# Altium PCB Phaser.PcbDoc (part 1 of 16)
Units mm, origin at the board's own origin, x right, y up, seen from the top; angles counter-clockwise.
Board outline 161.99 x 100 mm, 6 copper layers (TopLayer, MidLayer1, MidLayer2, SignalLayer1, Internal Plane 1, BottomLayer), stack 1.528 mm thick; 1017 components, 665 nets, 3453 pads, 2223 vias.
Unrouted connection lines stored in the file: 1.
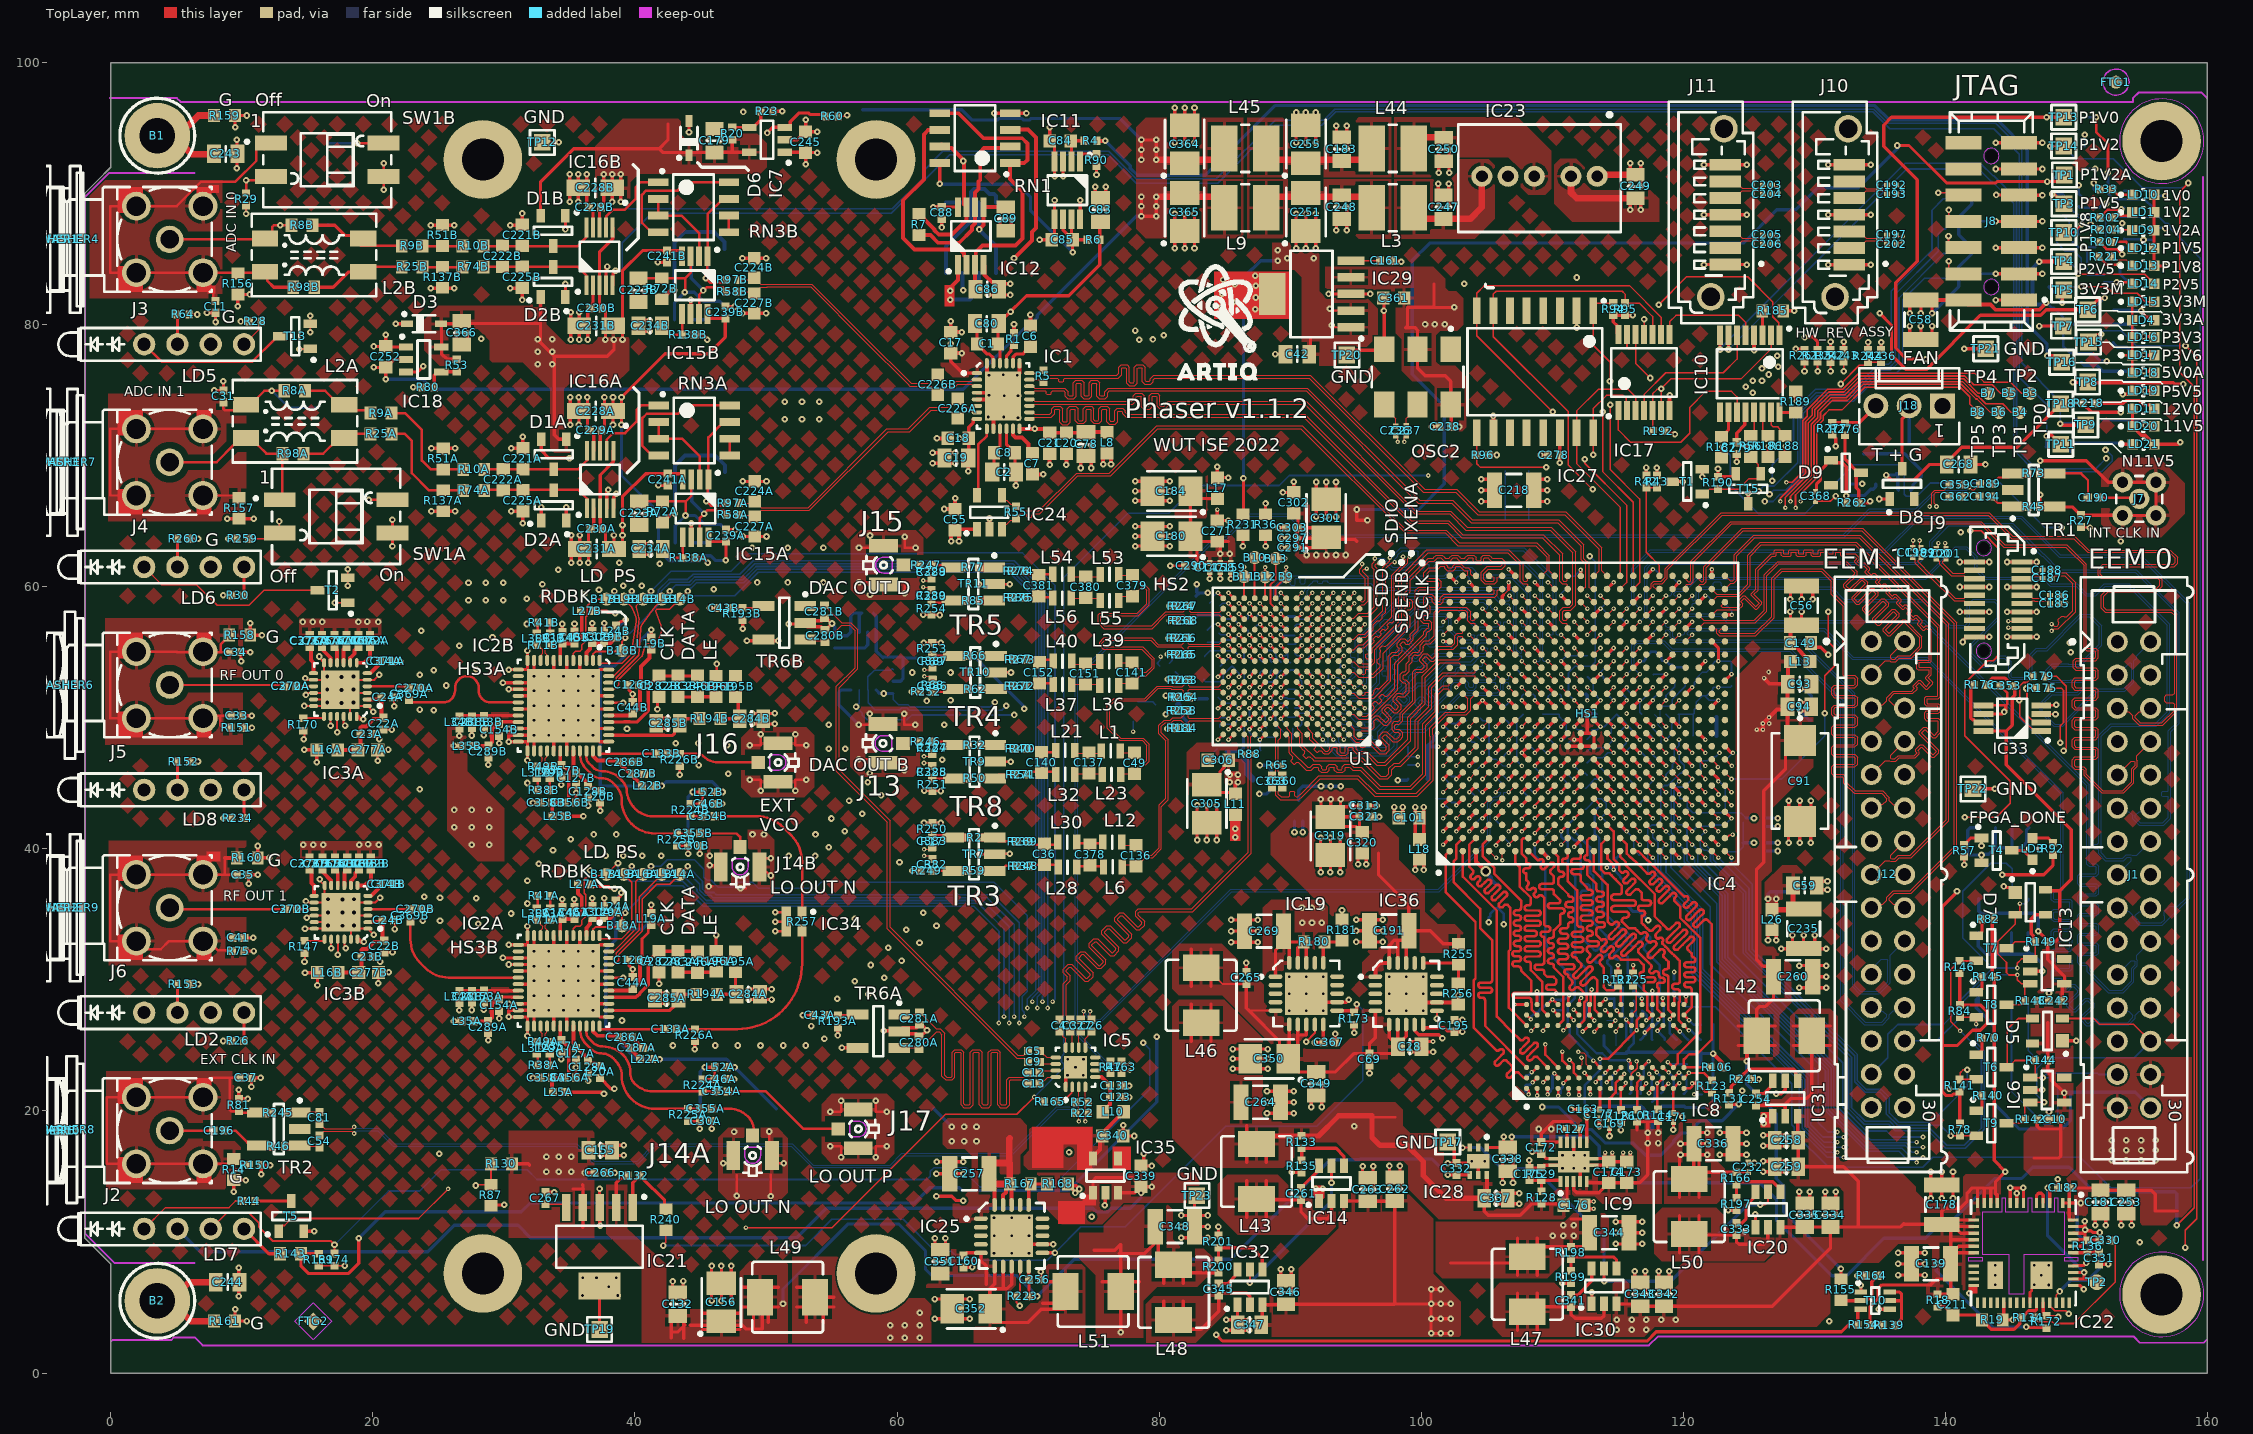
[diagram p0: TopLayer view]
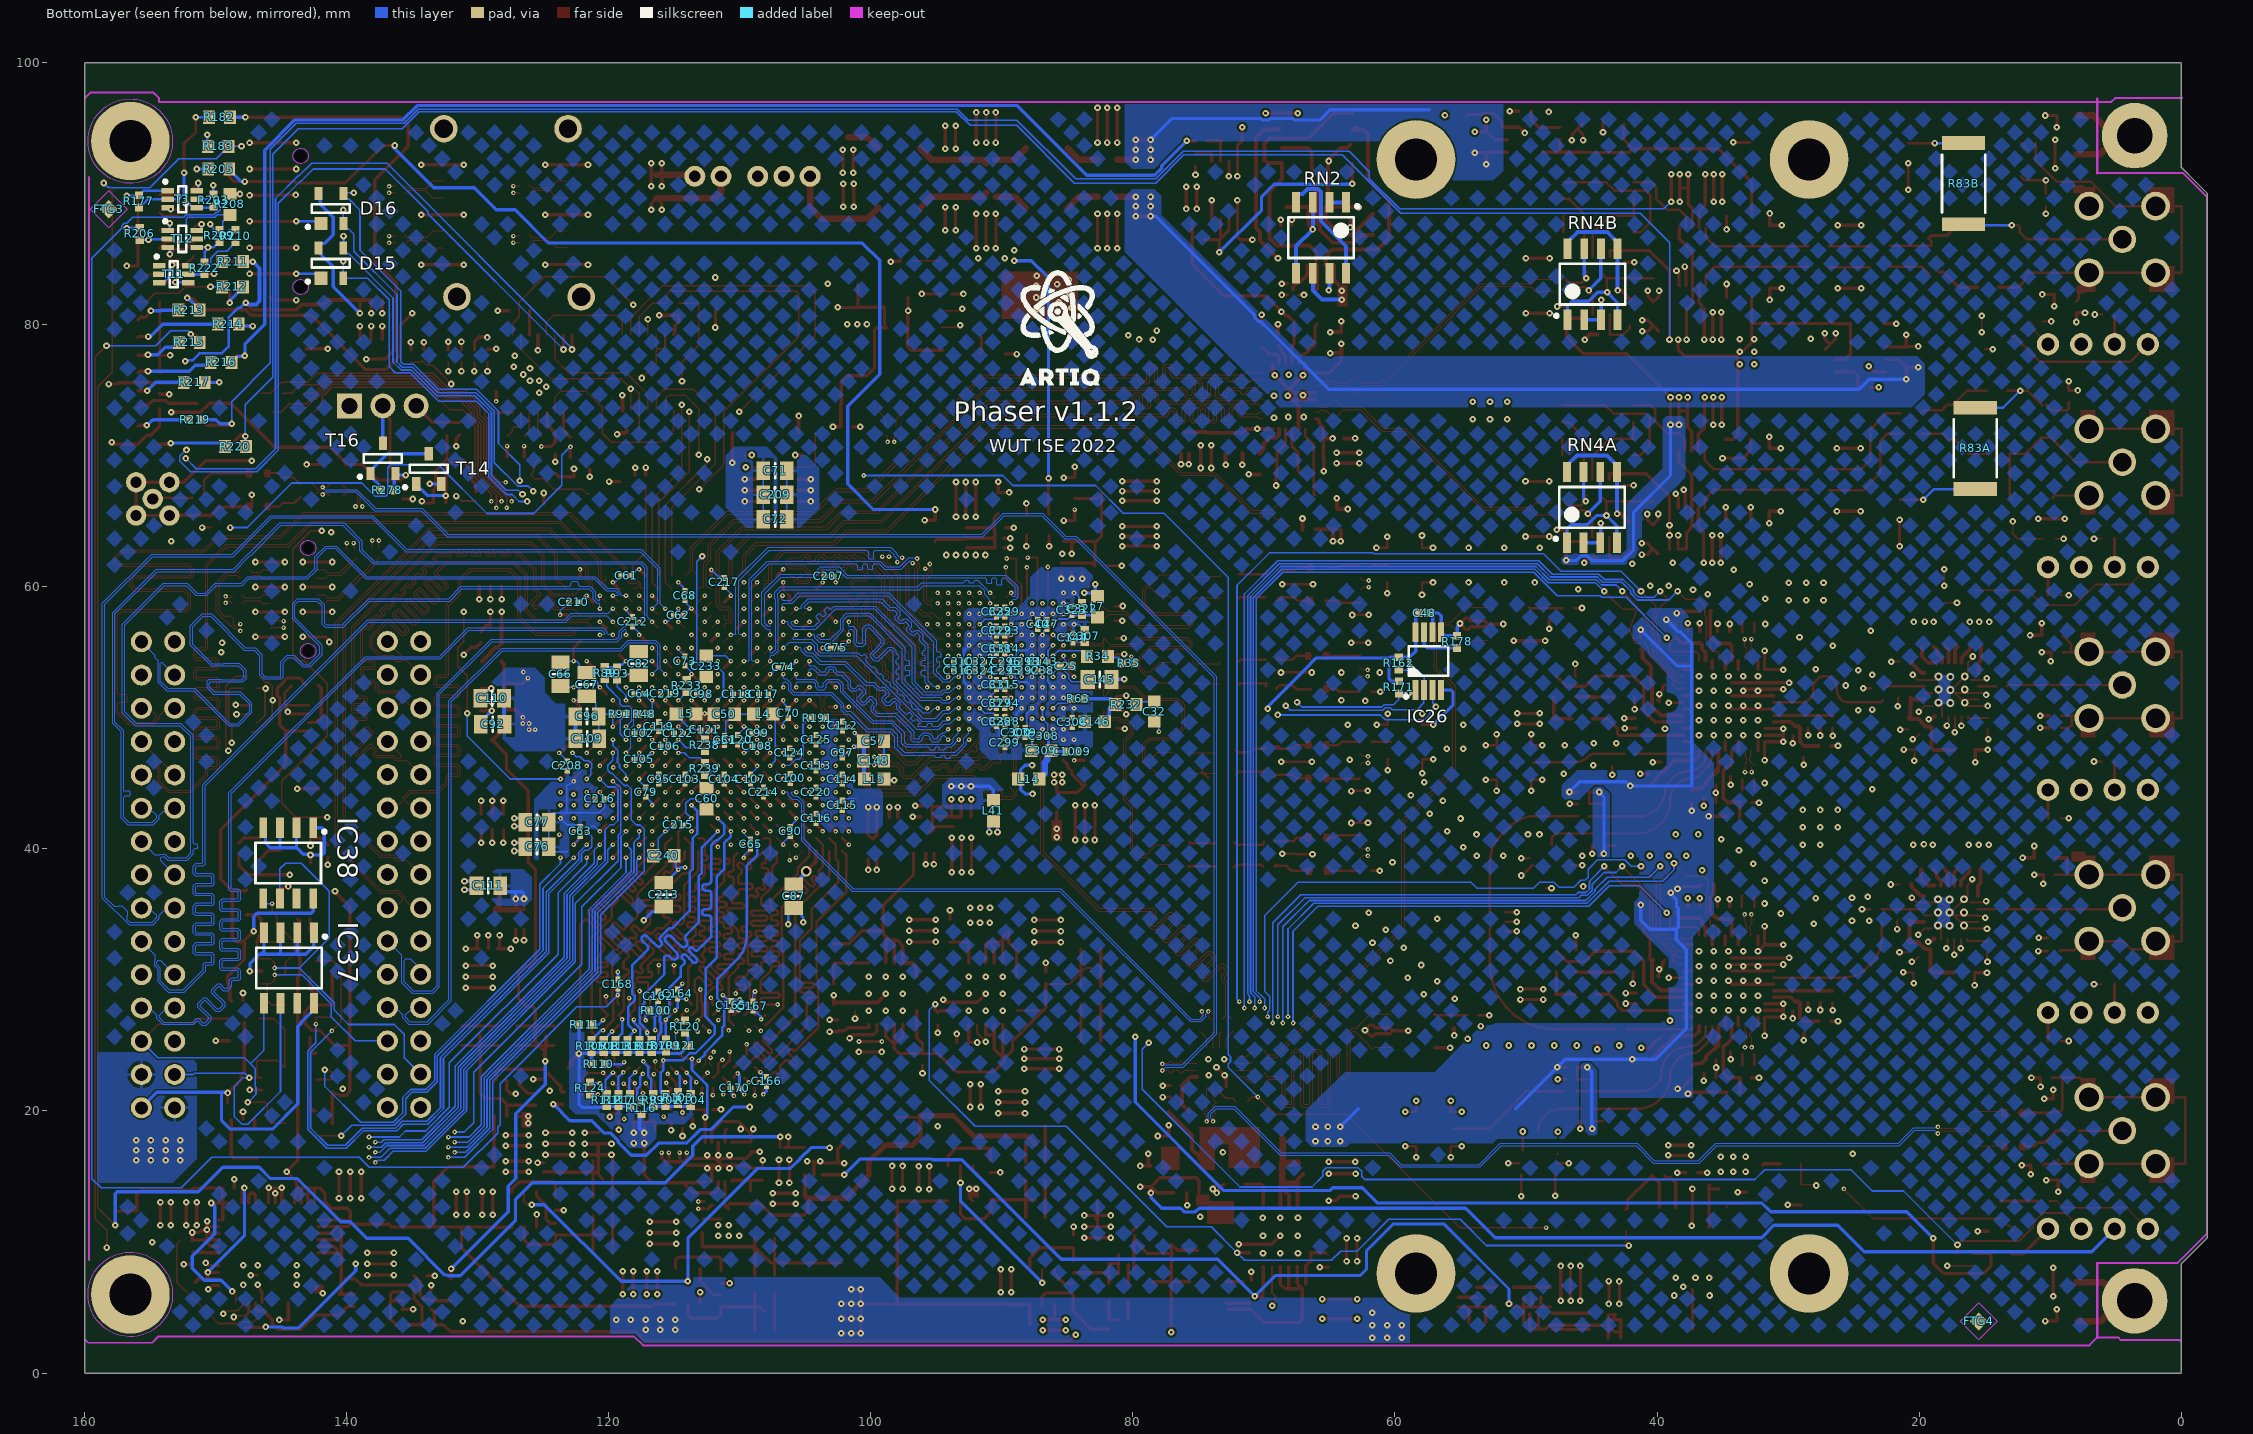
[diagram p1: BottomLayer view, seen from below]
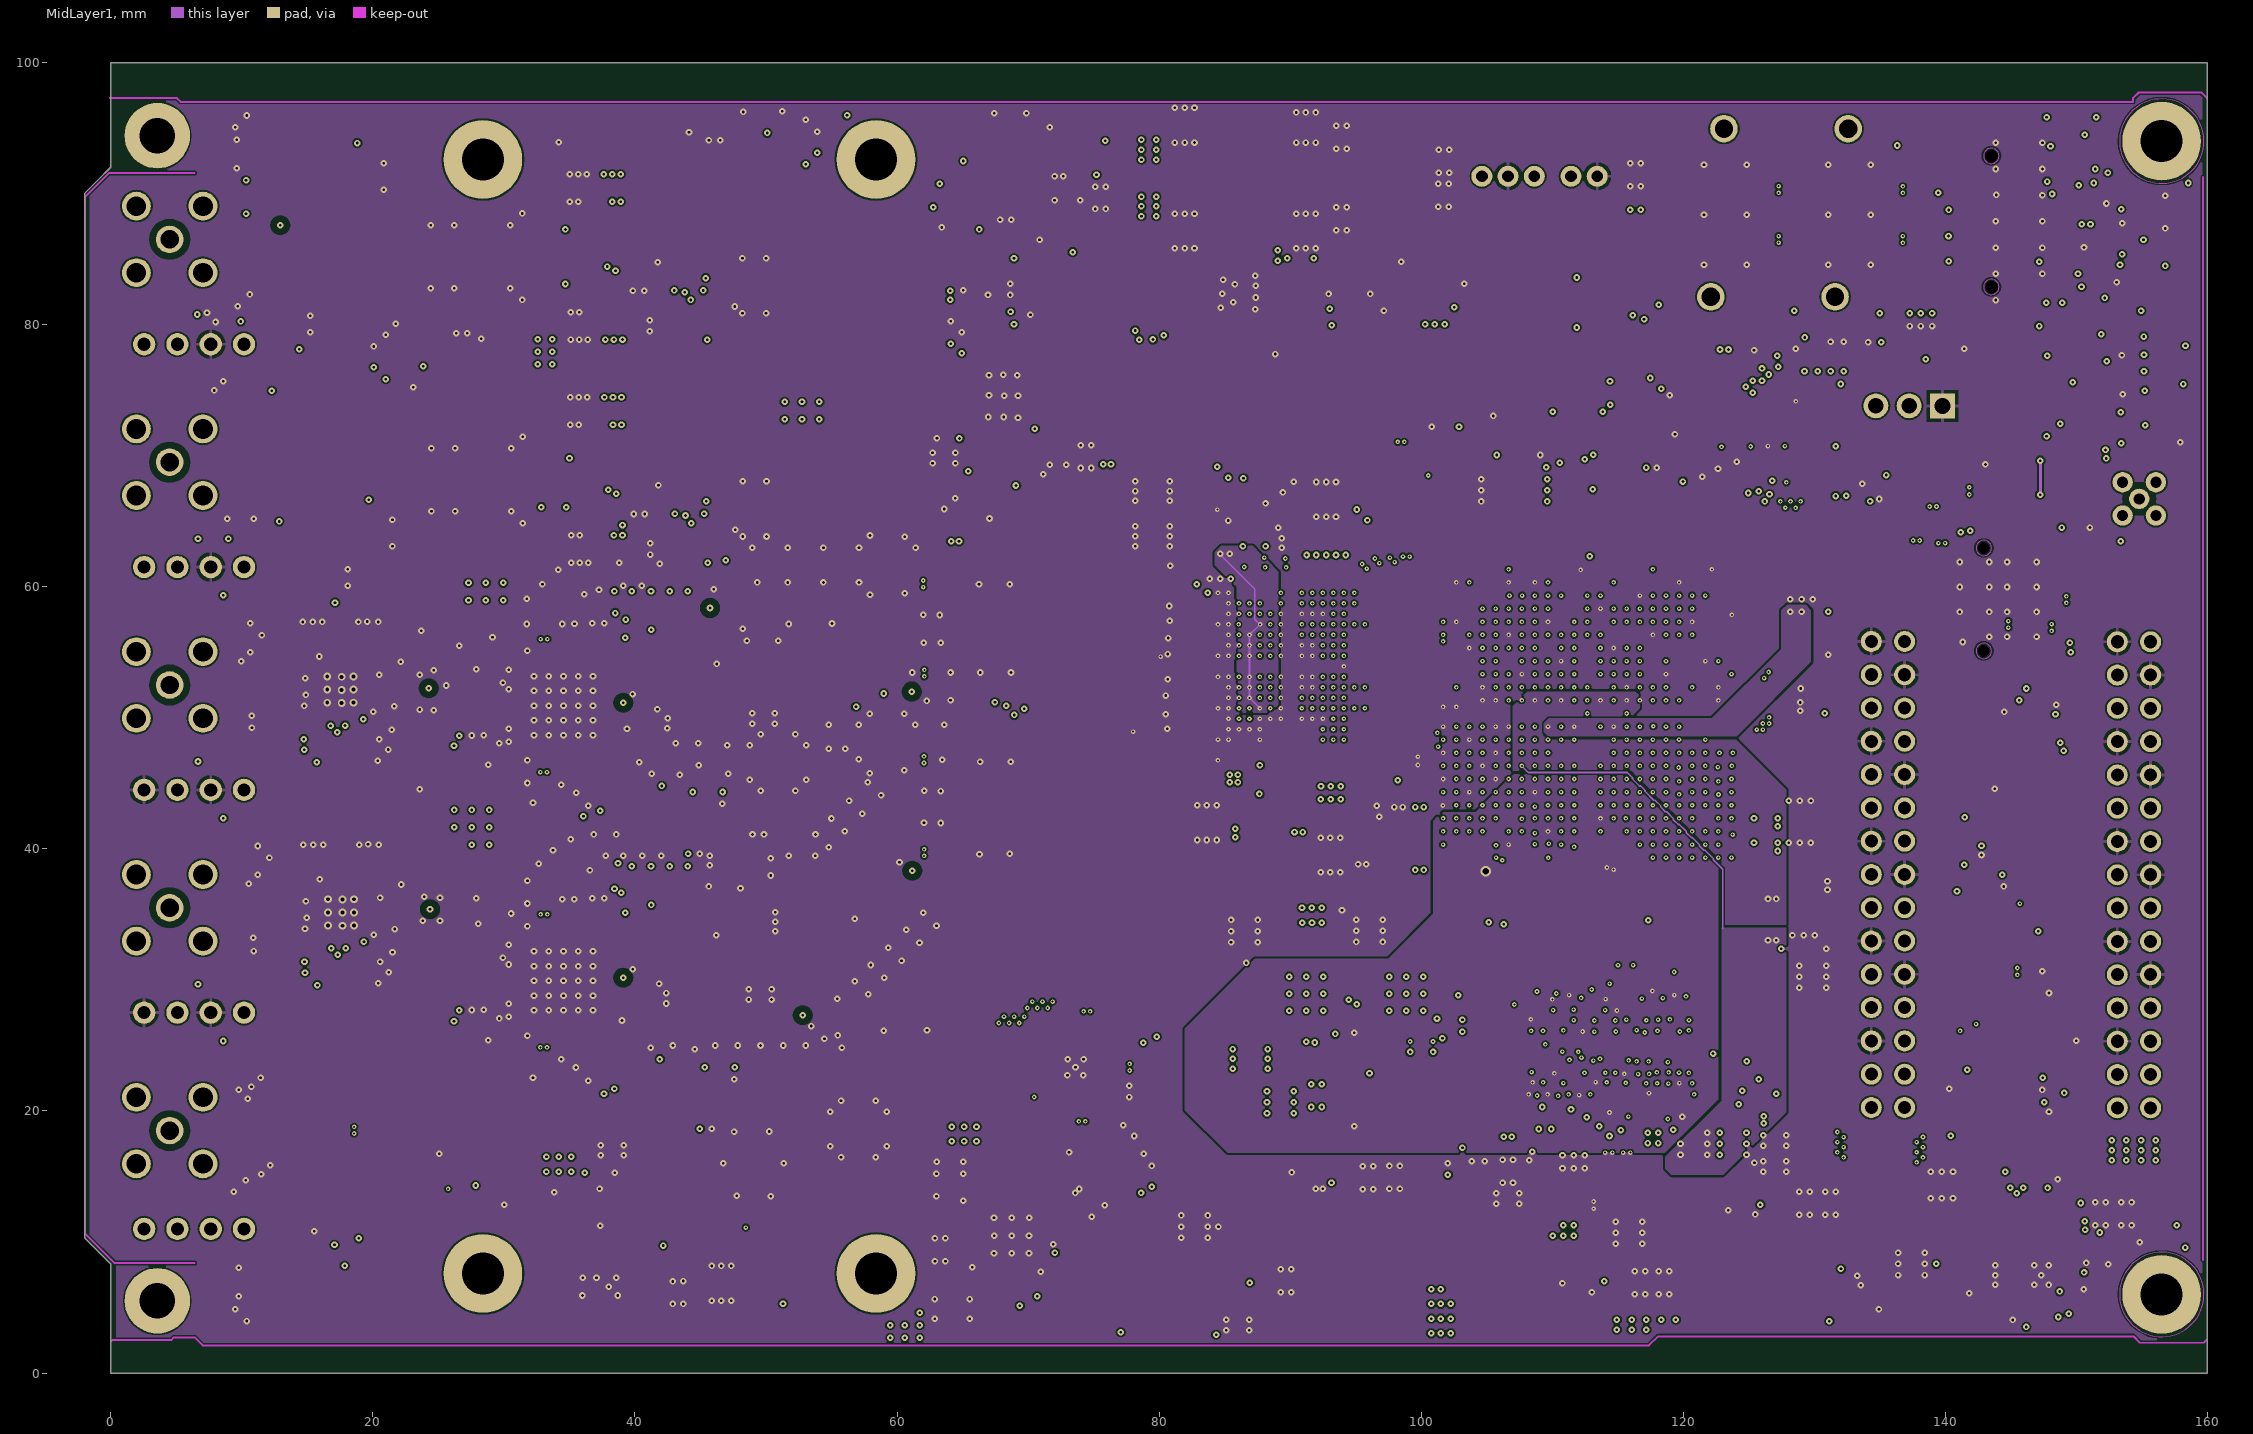
[diagram p2: MidLayer1]
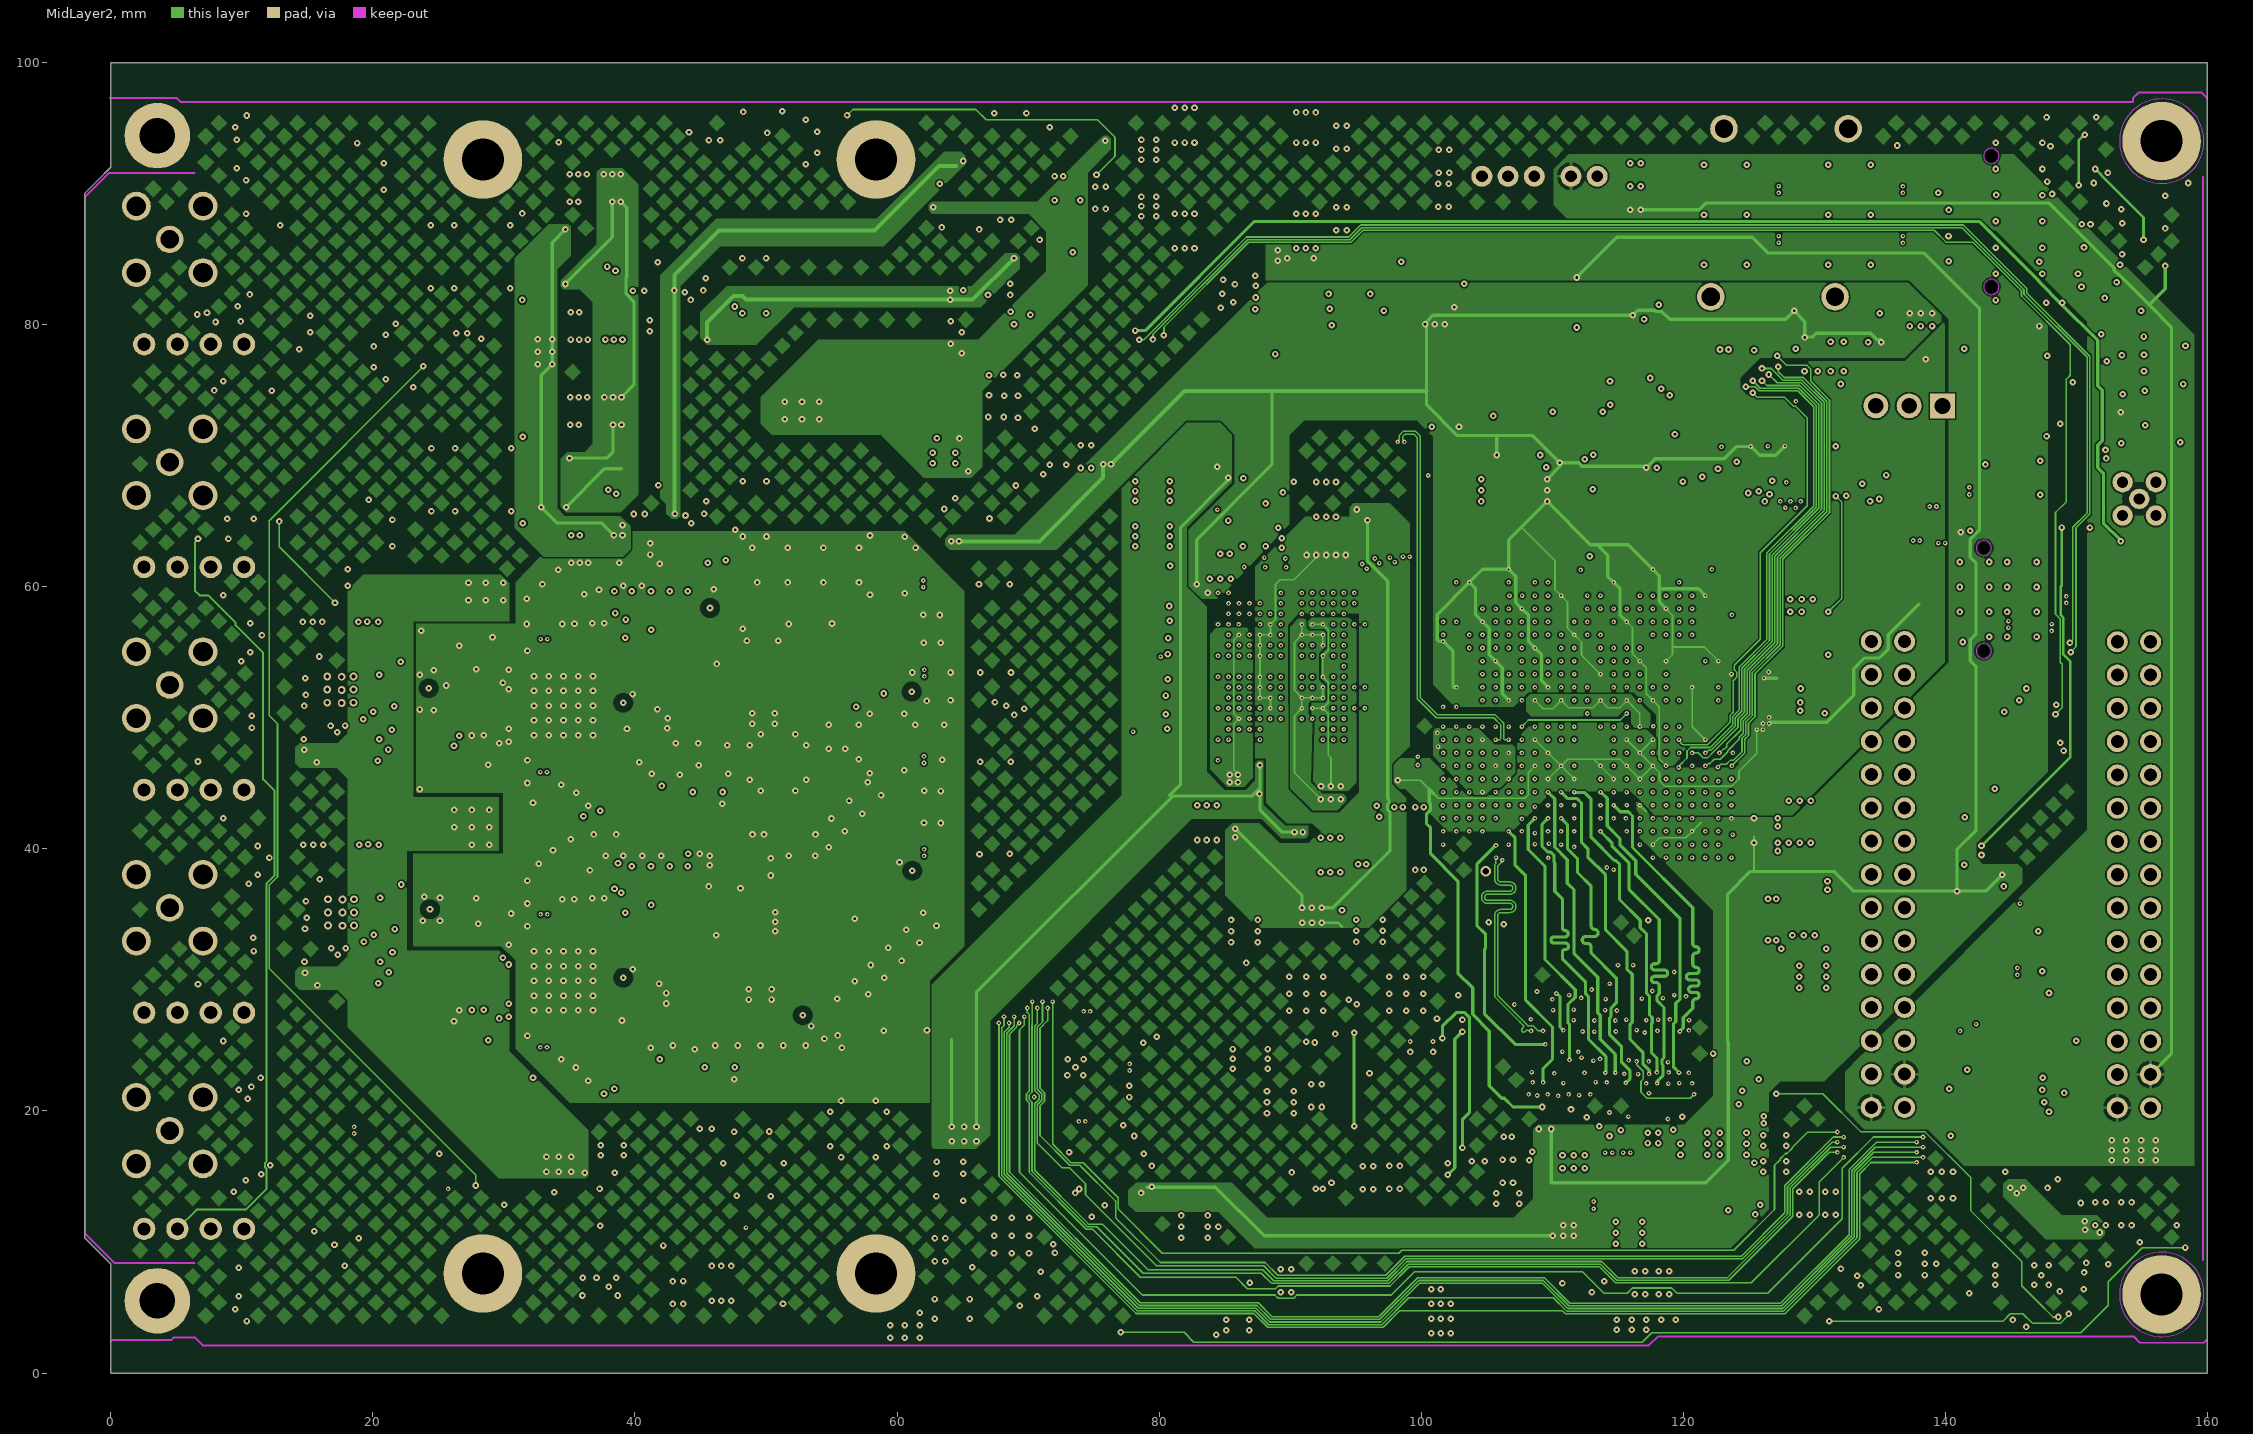
[diagram p3: MidLayer2]
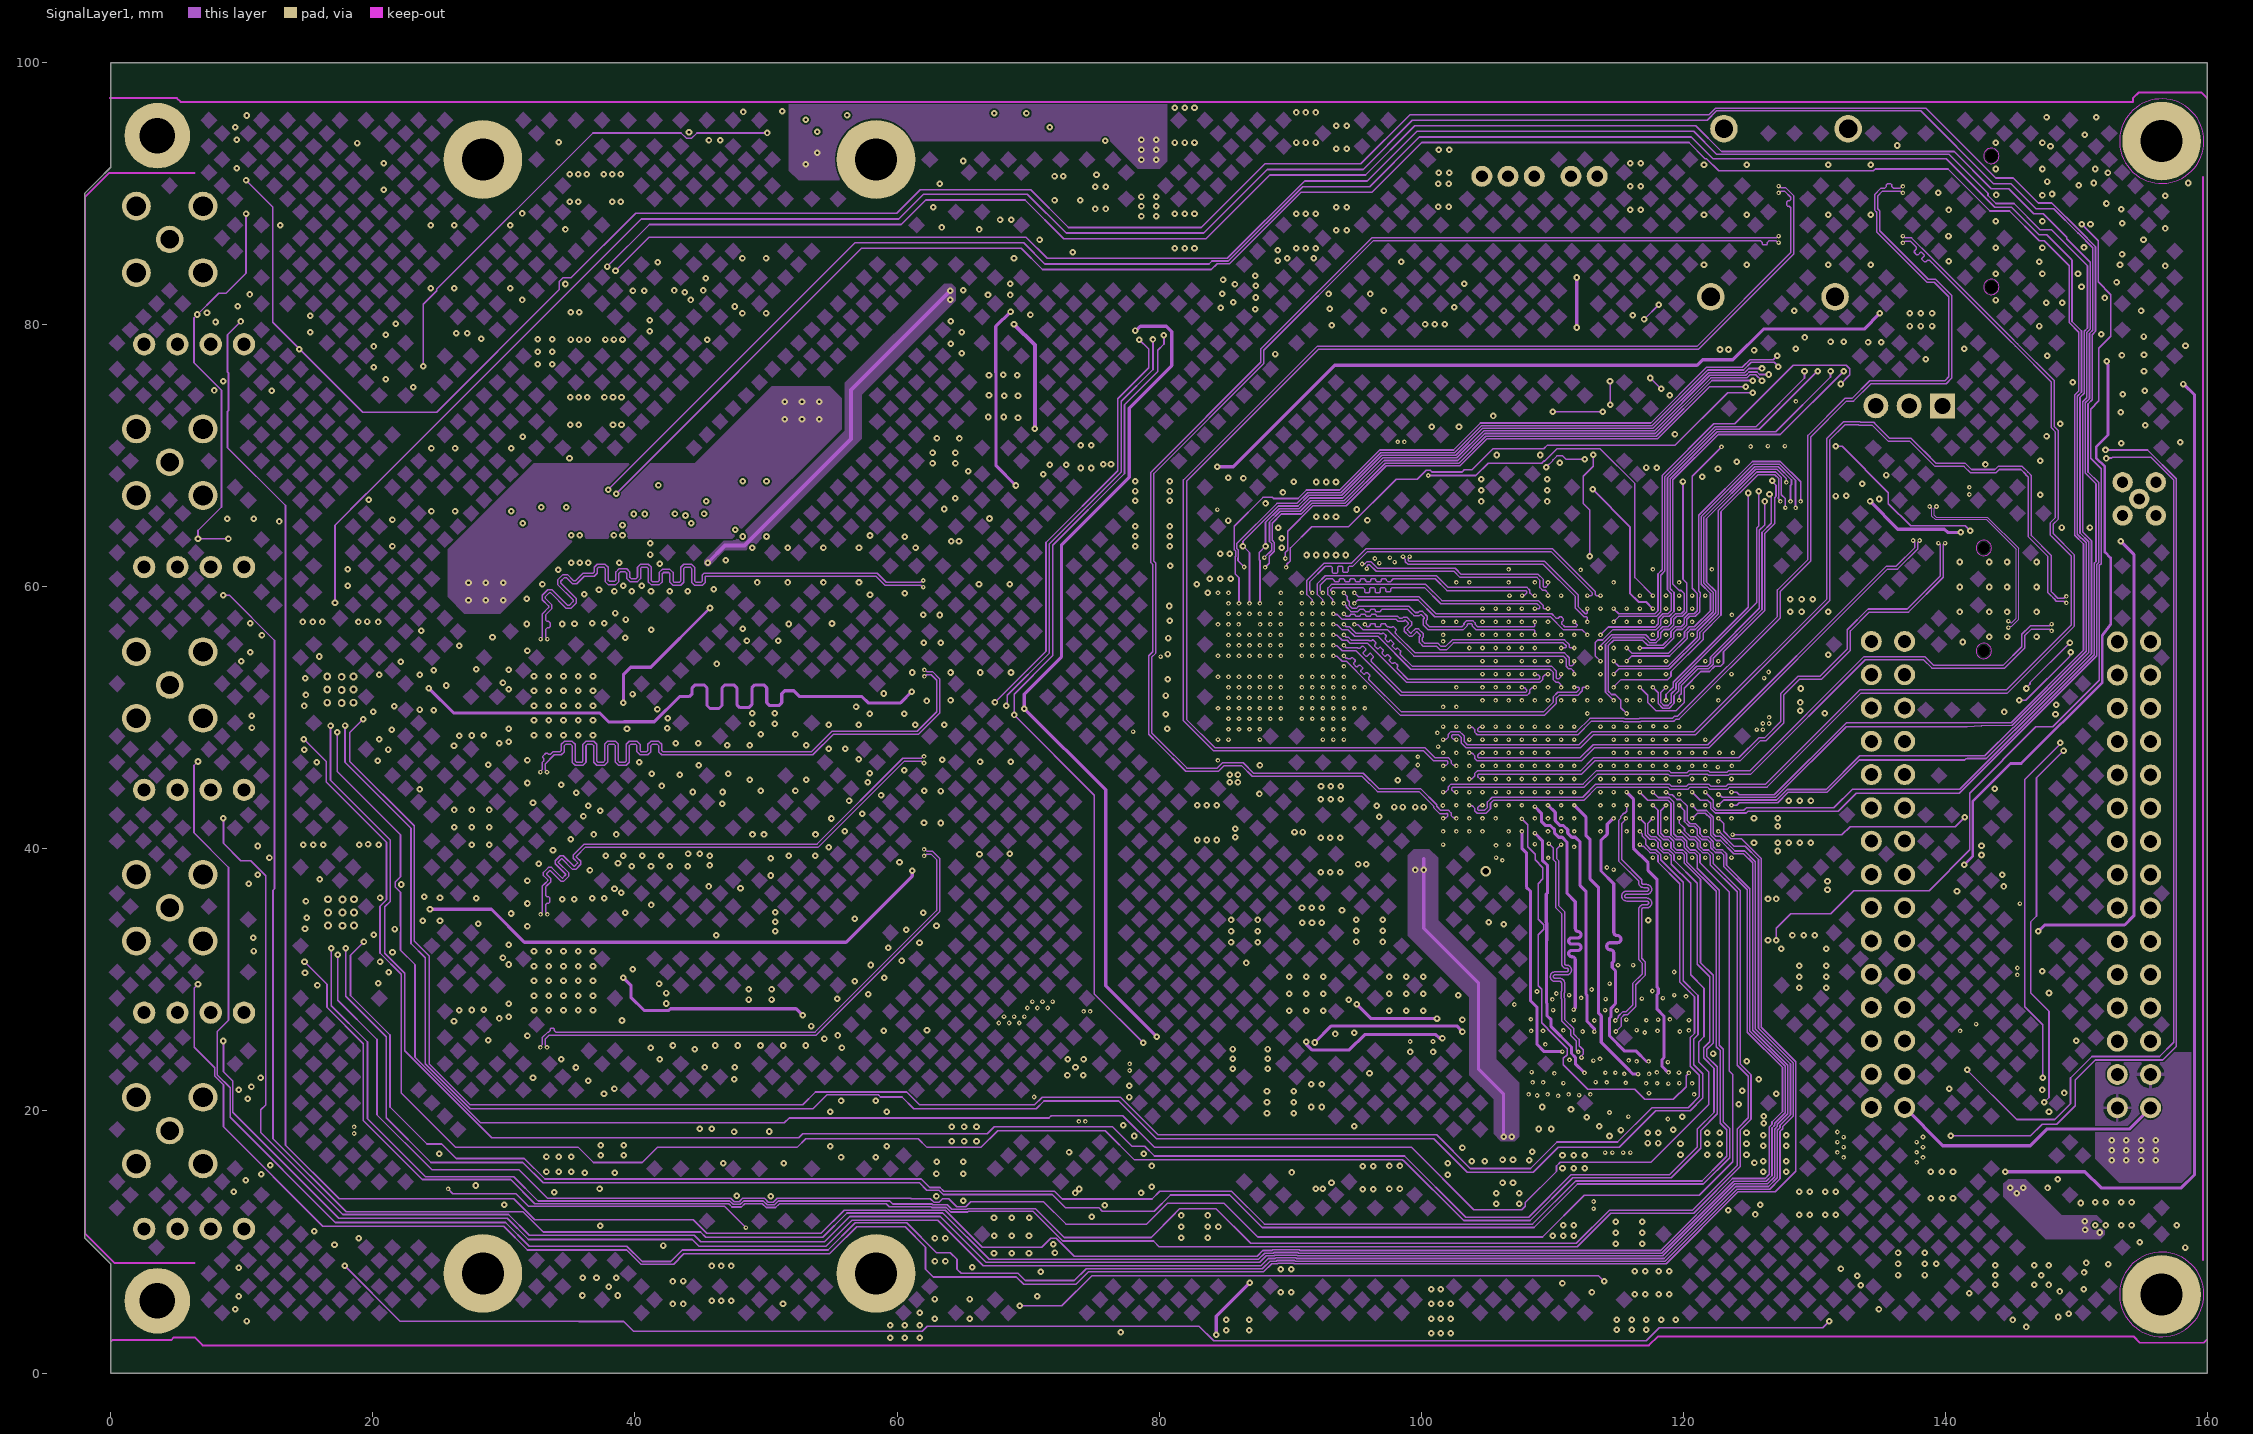
[diagram p4: SignalLayer1]
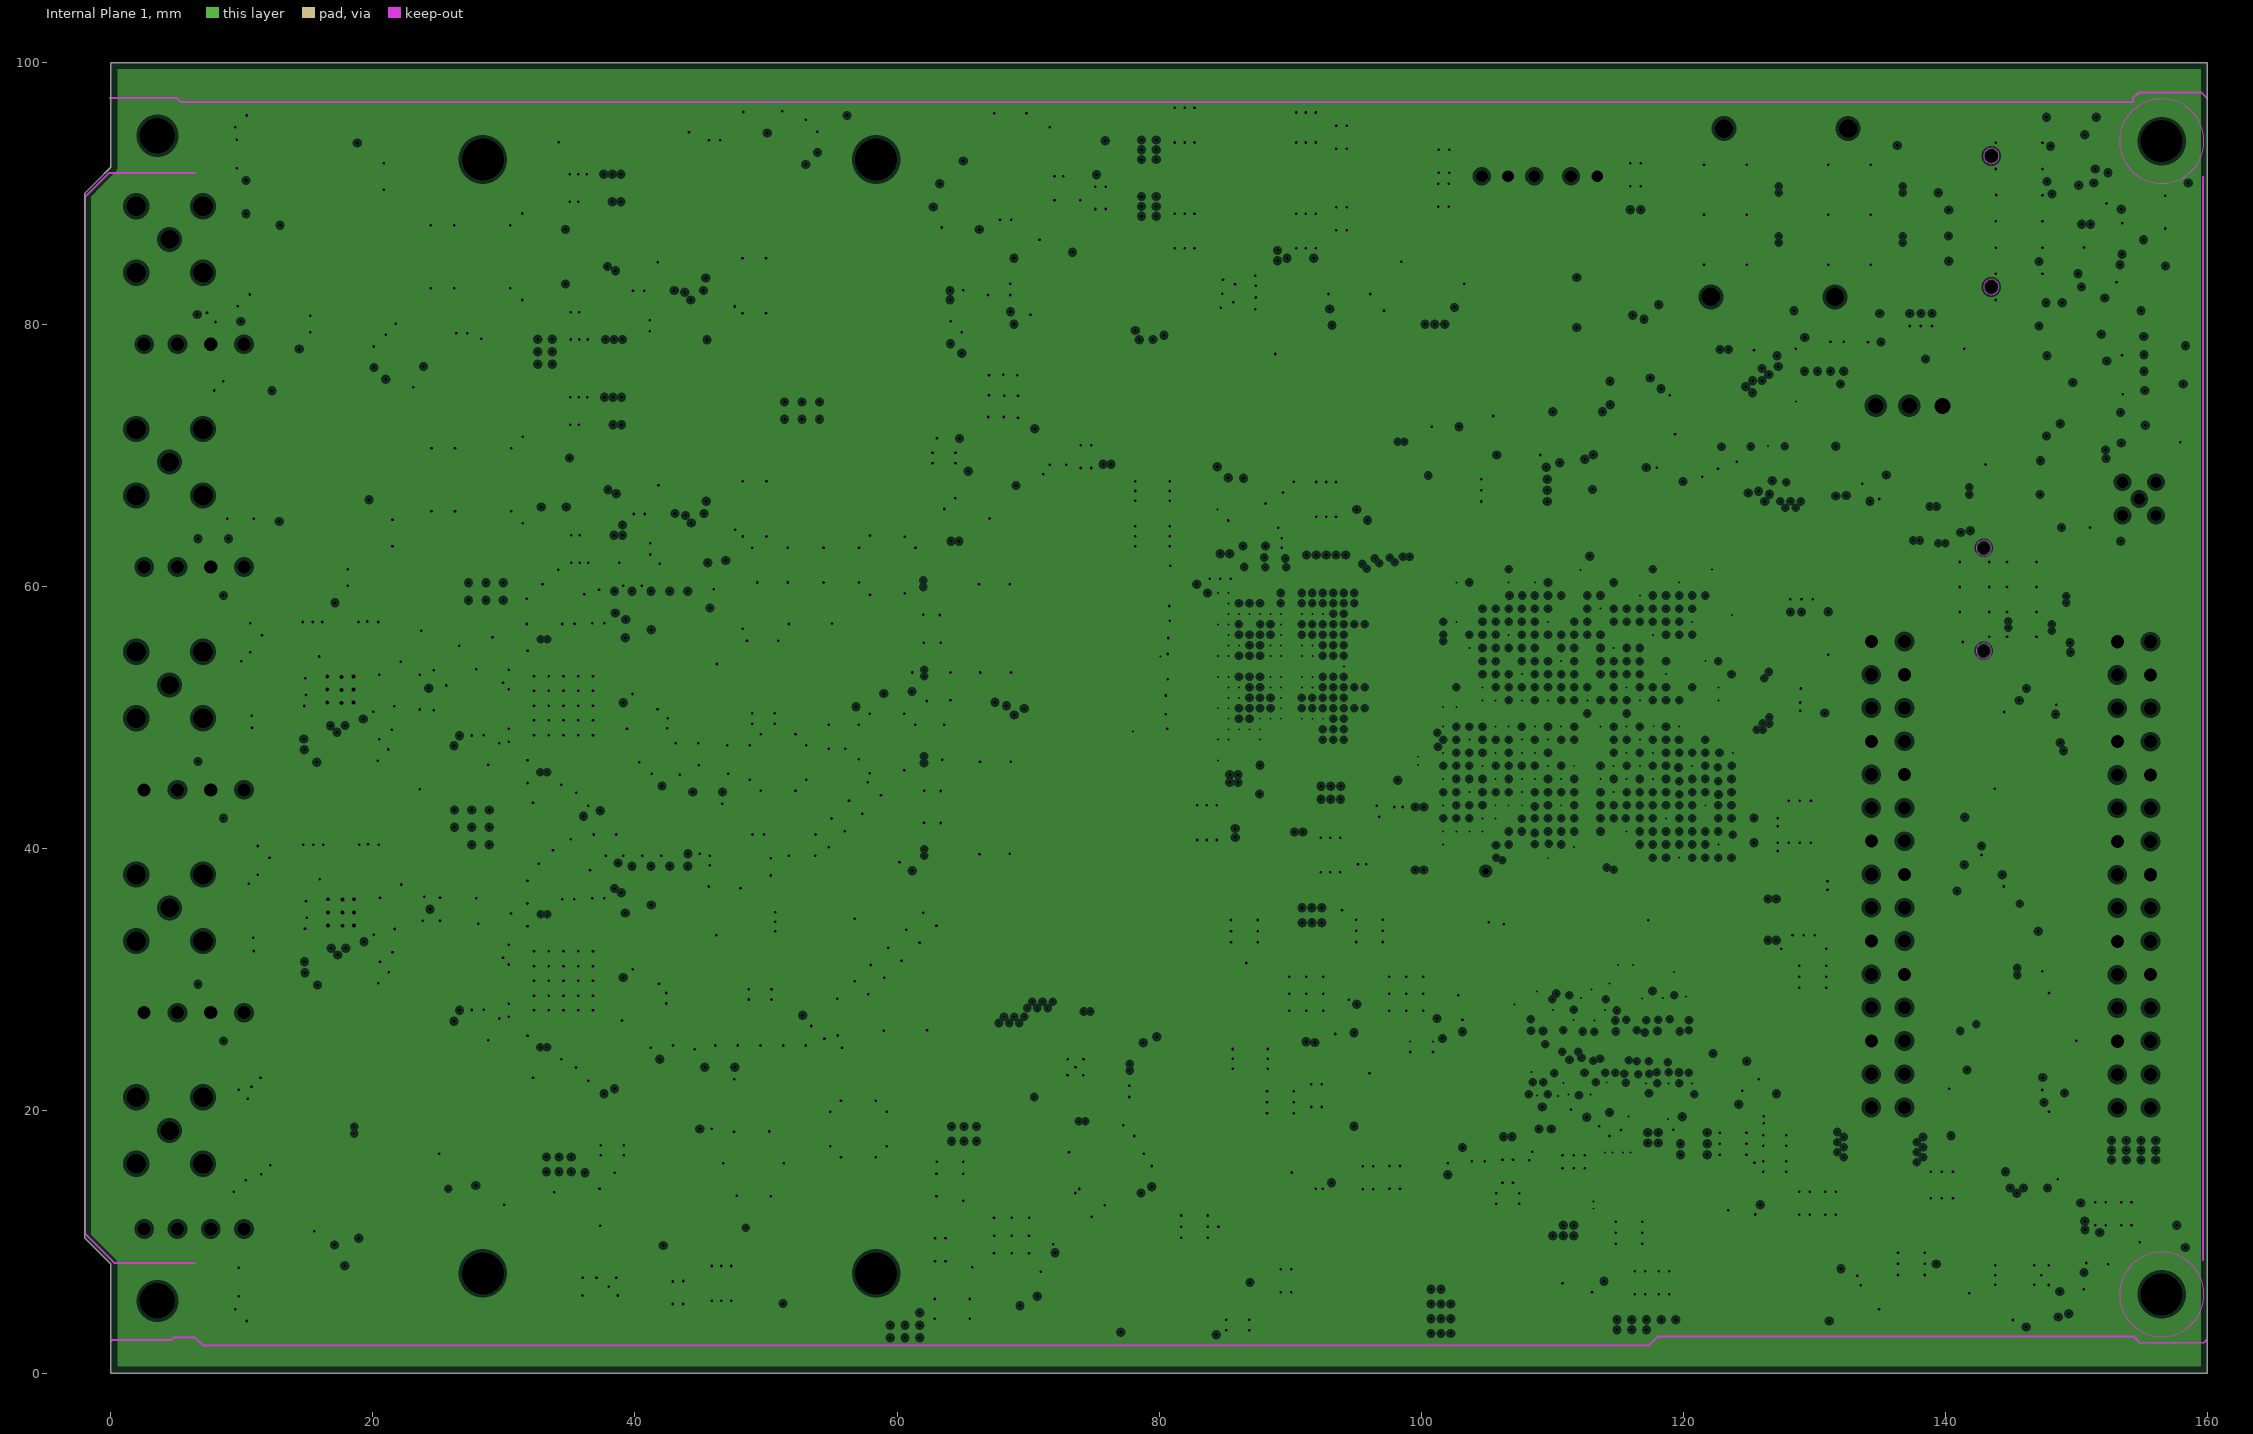
[diagram p5: Internal Plane 1, clearances drawn from the general rule]

## Layer stack, top to bottom
TopSolder: solder mask 0.0225, Solder Resist, Dk 3.5
TopLayer: signal copper 0.053
Dielectric1: core 0.11, FR-4, Dk 4.2
MidLayer1: signal copper 0.018
Dielectric2: prepreg 0.2, FR-4, Dk 4.2
MidLayer2: signal copper 0.018
Dielectric3: core 0.73, FR-4, Dk 4.2
SignalLayer1: signal copper 0.018
Dielectric4: prepreg 0.2, FR-4, Dk 4.2
Internal Plane 1: plane copper 0.018, net GND
Dielectric5: core 0.11, FR-4, Dk 4.2
BottomLayer: signal copper 0.053
BottomSolder: solder mask 0.0225, Solder Resist, Dk 3.5

## Board outline
-2,10.32 -2,83.025 -2,90 -1,91 0,92 0,100 159.995,100 159.995,0 0,0 0,8.32

## Design rules (kind name [scope] priority, off if disabled: settings)
AcuteAngle [All] p1: minimum=6.00000000000000E+0001 checktracksonly=FALSE
AssemblyTestPointUsage [All] p1 off:
AssemblyTestpoint [All] p1 off: testpointundercomponent=TRUE minsize=1.016 maxsize=2.54 preferedsize=1.524 minholesize=0 maxholesize=1.016 preferedholesize=0.813 testpointgrid=0.025 usegrid=TRUE gridtolerance=0 allowsidetop=TRUE allowsidebottom=TRUE
BoardOutlineClearance [All] p1: gap=0.4 ignorepadtopadclearanceinfootprint=FALSE
Clearance Clearance_50Ohm_Poly [InNetClass('50_Ohms') vs InPolygon] p1: gap=0.5 ignorepadtopadclearanceinfootprint=FALSE except(0: Arc-Hole Track-Hole SMDPad-Hole THPad-Hole Via-Hole Fill-Hole Poly-Hole Region-Hole Text-Hole)
Clearance Clearance_outer [OnLayer('TopLayer') or OnLayer('BottomLayer')] p2: gap=0.089 ignorepadtopadclearanceinfootprint=FALSE except(0: Arc-Hole Track-Hole SMDPad-Hole THPad-Hole Via-Hole Fill-Hole Poly-Hole Region-Hole Text-Hole; 0.1: Arc-Fill Arc-Region Track-Fill Track-Region Fill-Fill Fill-Region Poly-Region Region-Region; 0.127: Arc-Poly Track-Poly SMDPad-Poly THPad-Poly Fill-Poly Poly-Poly; 0.15: Via-Fill Via-Region; 0.152: Via-Poly; 0.2: Arc-THPad Track-THPad SMDPad-THPad THPad-THPad THPad-Via; 0.254: Arc-Text Track-Text SMDPad-Text THPad-Text Via-Text Fill-Text Poly-Text Region-Text Text-Text; 0.275: Via-Via)
Clearance Clearance_inner [(OnLayer('MidLayer1') OR OnLayer('MidLayer2') OR OnLayer('SignalLayer1'))] p3: gap=0.254 ignorepadtopadclearanceinfootprint=FALSE except(0: Arc-Hole Track-Hole SMDPad-Hole THPad-Hole Via-Hole Fill-Hole Poly-Hole Region-Hole Text-Hole; 0.076: Arc-Arc Arc-Track Arc-SMDPad Arc-Via Track-Track Track-SMDPad Track-Via SMDPad-SMDPad SMDPad-Via SMDPad-Fill SMDPad-Region THPad-Fill THPad-Region; 0.1: Track-Region; 0.127: Arc-Poly Track-Poly SMDPad-Poly THPad-Poly Via-Poly Fill-Poly; 0.15: Via-Fill Via-Region Region-Region; 0.152: Poly-Poly Poly-Region; 0.2: THPad-Via; 0.25: Arc-THPad Arc-Fill Arc-Region Track-THPad Track-Fill SMDPad-THPad THPad-THPad Via-Via Fill-Fill Fill-Region)
Clearance Clearance_inner_lvds_mid2 [(OnLayer('MidLayer2') AND InNetClass('Diff_100Ohm'))] p4: gap=0.54 ignorepadtopadclearanceinfootprint=FALSE except(0: Arc-Hole Track-Hole SMDPad-Hole THPad-Hole Via-Hole Fill-Hole Poly-Hole Region-Hole Text-Hole)
Clearance Clearance_inner_lvds_sign1 [(InDifferentialPairClass('All Differential Pairs'))] p5: gap=0.54 ignorepadtopadclearanceinfootprint=FALSE except(0: Arc-Hole Track-Hole SMDPad-Hole THPad-Hole Via-Hole Fill-Hole Poly-Hole Region-Hole Text-Hole; 0.076: Arc-Via Track-Via SMDPad-Via; 0.1: Arc-SMDPad Track-SMDPad; 0.2: Arc-THPad Track-THPad SMDPad-SMDPad THPad-Via Via-Via)
Clearance Clearance_poly_balancing [InNamedPolygon('BAL_TOP') or InNamedPolygon('BAL_BOT') or InNamedPolygon('ML1_BAL') or  InNamedPolygon('ML2_BAL')] p6: gap=0.152 ignorepadtopadclearanceinfootprint=FALSE
ComponentClearance [All] p1 off: gap=0.254 collisioncheckmode=3 verticalgap=0.254 showdistances=FALSE
DiffPairsRouting DiffPairsRouting_100_Ohm [InDifferentialPairClass('Diff_100Ohm')] p1: maxlimit=0.25 minlimit=0.12 mostfreqgap=0.12 toplayer_mingap=0.125 toplayer_maxgap=0.125 toplayer_prefgap=0.125 toplayer_minwidth=0.095 toplayer_maxwidth=0.095 toplayer_prefwidth=0.095 midlayer1_mingap=0.25 midlayer1_prefgap=0.25 midlayer1_minwidth=0.15 midlayer1_maxwidth=0.15 midlayer1_prefwidth=0.15 midlayer2_maxgap=0.12 midlayer2_minwidth=0.1 midlayer2_maxwidth=0.115 midlayer2_prefwidth=0.115 midlayer7_maxgap=0.12 midlayer7_minwidth=0.1 midlayer7_maxwidth=0.115 midlayer7_prefwidth=0.115 bottomlayer_mingap=0.125 bottomlayer_maxgap=0.125 bottomlayer_prefgap=0.125 bottomlayer_minwidth=0.095 bottomlayer_maxwidth=0.095 bottomlayer_prefwidth=0.095 maxuncoupledlength=11.1
DiffPairsRouting DiffPairsRouting_90_Ohm [InDifferentialPairClass('Diff_90Ohm')] p2: maxlimit=0.15 minlimit=0.12 mostfreqgap=0.12 toplayer_mingap=0.15 toplayer_prefgap=0.15 toplayer_minwidth=0.135 toplayer_maxwidth=0.135 toplayer_prefwidth=0.135 midlayer1_mingap=0.125 midlayer1_maxgap=0.125 midlayer1_prefgap=0.125 midlayer1_minwidth=0.312 midlayer1_maxwidth=0.312 midlayer1_prefwidth=0.312 midlayer2_maxgap=0.12 midlayer2_minwidth=0.15 midlayer2_maxwidth=0.15 midlayer2_prefwidth=0.15 midlayer7_maxgap=0.12 midlayer7_minwidth=0.15 midlayer7_maxwidth=0.15 midlayer7_prefwidth=0.15 bottomlayer_mingap=0.15 bottomlayer_prefgap=0.15 bottomlayer_minwidth=0.135 bottomlayer_maxwidth=0.135 bottomlayer_prefwidth=0.135 maxuncoupledlength=12.7
DiffPairsRouting DiffPairsRouting_lvpecl [InDifferentialPairClass('LVPECL')] p3: maxlimit=0.31 minlimit=0.125 mostfreqgap=0.31 toplayer_maxgap=0.125 toplayer_prefgap=0.125 toplayer_minwidth=0.095 toplayer_maxwidth=0.095 toplayer_prefwidth=0.095 midlayer1_mingap=0.25 midlayer1_maxgap=0.25 midlayer1_prefgap=0.25 midlayer1_minwidth=0.15 midlayer1_maxwidth=0.15 midlayer1_prefwidth=0.15 midlayer2_mingap=0.31 midlayer2_minwidth=0.165 midlayer2_maxwidth=0.165 midlayer2_prefwidth=0.165 midlayer7_mingap=0.31 midlayer7_minwidth=0.165 midlayer7_maxwidth=0.165 midlayer7_prefwidth=0.165 bottomlayer_maxgap=0.125 bottomlayer_prefgap=0.125 bottomlayer_minwidth=0.095 bottomlayer_maxwidth=0.095 bottomlayer_prefwidth=0.095 maxuncoupledlength=3
FabricationTestPointUsage TestPointUsage [All] p1: valid=0 allowmultiple=FALSE
FabricationTestpoint Testpoint [All] p1: side=3 testpointundercomponent=TRUE minsize=1.016 maxsize=2.54 preferedsize=1.524 minholesize=0.508 maxholesize=1.016 preferedholesize=0.813 testpointgrid=0.025 allowsidetop=TRUE allowsidebottom=TRUE usegrid=TRUE gridtolerance=0
Height Height_1 [OnLayer('BottomLayer')] p2: minheight=0 maxheight=2 prefheight=1
HoleSize [All] p1: absolutevalues=TRUE maxlimit=3.2 minlimit=0.15 maxpercent=80.000 minpercent=20.000
HoleToHoleClearance [All] p1: gap=0.15 allowstackedmicrovias=TRUE
MatchedLengths MatchedLengths_GTP_J9 [InxSignalClass('GTP_J9')] p1: tolerance=1 checknetsindiffpair=TRUE checkdiffpairvsdiffpair=FALSE checkxsignals=FALSE checkothers=FALSE
MatchedLengths MatchedLengths_GTP_J10 [InxSignalClass('GTP_J10')] p2: tolerance=1 checknetsindiffpair=TRUE checkdiffpairvsdiffpair=FALSE checkxsignals=FALSE checkothers=FALSE
MatchedLengths MatchedLengths_GTP_J11 [InxSignalClass('GTP_J11')] p3: tolerance=1 checknetsindiffpair=TRUE checkdiffpairvsdiffpair=FALSE checkxsignals=FALSE checkothers=FALSE
MatchedLengths MatchedLengths_EEM0 [InNetClass('EEM0')] p4: tolerance=10 checknetsindiffpair=FALSE checkdiffpairvsdiffpair=TRUE checkxsignals=TRUE checkothers=TRUE
MatchedLengths MatchedLengths_EEM1 [InNetClass('EEM1')] p5: tolerance=10 checknetsindiffpair=FALSE checkdiffpairvsdiffpair=TRUE checkxsignals=TRUE checkothers=TRUE
MatchedLengths MatchedLengths_DDR_CLOCKS_STROBES [InxSignalClass('ADDR_PP1') OR InxSignalClass('DATA_BL0')] p6: tolerance=0.508 checknetsindiffpair=TRUE checkdiffpairvsdiffpair=FALSE checkxsignals=FALSE checkothers=FALSE
MatchedLengths MatchedLengths_DATA_BL0 [InxSignalClass('DATA_BL0')] p7: tolerance=1.3 checknetsindiffpair=FALSE checkdiffpairvsdiffpair=TRUE checkxsignals=TRUE checkothers=TRUE
MatchedLengths MatchedLengths_ADDR_PP1 [InxSignalClass('ADDR_PP1')] p8: tolerance=2 checknetsindiffpair=FALSE checkdiffpairvsdiffpair=TRUE checkxsignals=TRUE checkothers=TRUE
MatchedLengths MatchedLengths_Clock_Fanout [InxSignalClass('Clock fanout')] p9: tolerance=1 checknetsindiffpair=FALSE checkdiffpairvsdiffpair=TRUE checkxsignals=TRUE checkothers=TRUE
MatchedLengths MatchedLengths_Clock_Fanout_DAC [InxSignalClass('Clock Fanout-DAC')] p10: tolerance=1 checknetsindiffpair=FALSE checkdiffpairvsdiffpair=TRUE checkxsignals=TRUE checkothers=TRUE
MatchedLengths MatchedLengths_diff_clocks [InxSignalClass('Differential clocks-IC5') and InxSignalClass('Differential clocks-OSC2')] p11: tolerance=1 checknetsindiffpair=TRUE checkdiffpairvsdiffpair=FALSE checkxsignals=FALSE checkothers=FALSE
MatchedLengths MatchedLengths_DAC_Pair [InNetClass('DAC')] p12: tolerance=0.127 checknetsindiffpair=TRUE checkdiffpairvsdiffpair=FALSE checkxsignals=FALSE checkothers=FALSE
MatchedLengths MatchedLengths_DAC_Group [InNetClass('DAC')] p13: tolerance=10 checknetsindiffpair=FALSE checkdiffpairvsdiffpair=TRUE checkxsignals=TRUE checkothers=TRUE
MatchedLengths MatchedLengths_ADC [InxSignalClass('ADC')] p14: tolerance=0.127 checknetsindiffpair=FALSE checkdiffpairvsdiffpair=TRUE checkxsignals=TRUE checkothers=TRUE
MatchedLengths MatchedLengths_DAC_OUT_AB_Group [InxSignalClass('DAC-OUT_AB')] p15 off: tolerance=2 checknetsindiffpair=FALSE checkdiffpairvsdiffpair=TRUE checkxsignals=TRUE checkothers=TRUE
MatchedLengths MatchedLengths_DAC_OUT_CD_Group [InxSignalClass('DAC-OUT_CD')] p16 off: tolerance=2 checknetsindiffpair=FALSE checkdiffpairvsdiffpair=TRUE checkxsignals=TRUE checkothers=TRUE
MatchedLengths MatchedLengths_DAC_OUT_AB_Pair [InxSignalClass('DAC-OUT_AB')] p17: tolerance=1 checknetsindiffpair=TRUE checkdiffpairvsdiffpair=FALSE checkxsignals=FALSE checkothers=FALSE
MatchedLengths MatchedLengths_DAC_OUT_CD_Pair [InxSignalClass('DAC-OUT_CD')] p18: tolerance=1 checknetsindiffpair=TRUE checkdiffpairvsdiffpair=FALSE checkxsignals=FALSE checkothers=FALSE
MatchedLengths MatchedLengths_DAC_UPCONV_A_Group [InxSignalClass('DAC-UPCONVERTER_A')] p19 off: tolerance=1 checknetsindiffpair=FALSE checkdiffpairvsdiffpair=TRUE checkxsignals=TRUE checkothers=TRUE
MatchedLengths MatchedLengths_DAC_UPCONV_B_Group [InxSignalClass('DAC-UPCONVERTER_B')] p20 off: tolerance=1 checknetsindiffpair=FALSE checkdiffpairvsdiffpair=TRUE checkxsignals=TRUE checkothers=TRUE
MatchedLengths MatchedLengths_DAC_UPCONV_A_Pair [InxSignalClass('DAC-UPCONVERTER_A')] p21 off: tolerance=0.5 checknetsindiffpair=TRUE checkdiffpairvsdiffpair=FALSE checkxsignals=FALSE checkothers=FALSE
MatchedLengths MatchedLengths_DAC_UPCONV_B_Pair [InxSignalClass('DAC-UPCONVERTER_B')] p22 off: tolerance=0.2 checknetsindiffpair=TRUE checkdiffpairvsdiffpair=FALSE checkxsignals=FALSE checkothers=FALSE
MatchedLengths MatchedLengths_DAC_UPCONV_A&B_Group [InxSignalClass('DAC-UPCONVERTER_A&B')] p23 off: tolerance=1 checknetsindiffpair=FALSE checkdiffpairvsdiffpair=TRUE checkxsignals=TRUE checkothers=TRUE
MatchedLengths MatchedLengths_DAC_UPCONV_A&B_Pair [InxSignalClass('DAC-UPCONVERTER_A&B')] p24 off: tolerance=0.3 checknetsindiffpair=TRUE checkdiffpairvsdiffpair=FALSE checkxsignals=FALSE checkothers=FALSE
MatchedLengths MatchedLengths_sfp [InDifferentialPairClass('SFP_RX_TX')] p25: tolerance=1 checknetsindiffpair=TRUE checkdiffpairvsdiffpair=FALSE checkxsignals=FALSE checkothers=FALSE
MatchedLengths [InDifferentialPairClass('All Differential Pairs')] p26: tolerance=5 checknetsindiffpair=TRUE checkdiffpairvsdiffpair=FALSE checkxsignals=FALSE checkothers=FALSE
MinimumAnnularRing MinimumAnnularRing_outer [OnLayer('TopLayer') or OnLayer('BottomLayer')] p1: minimumring=0.05
MinimumAnnularRing MinimumAnnularRing_mid [OnLayer('MidLayer1') or OnLayer('MidLayer2') or OnLayer('MidLayer3') or OnLayer('MidLayer4')] p2: minimumring=0.15
MinimumSolderMaskSliver [All] p1: minsoldermaskwidth=0.15
ParallelSegment [All] p1 off: limit=5 gap=0.254
PlaneClearance [All] p1: clearance=0.254
PlaneConnect [All] p1: pad.planeconnectstyle=Relief pad.reliefexpansion=0.2 pad.reliefentries=4 pad.reliefconductorwidth=0.254 pad.reliefairgap=0.254 via.planeconnectstyle=Direct via.reliefexpansion=0.2 via.reliefentries=4 via.reliefconductorwidth=0.254 via.reliefairgap=0.15
PolygonConnect PolygonConnect_pad [IsPad] p1: connectstyle=Relief reliefconductorwidth=0.254 reliefentries=4 polygonreliefangle="90 Angle" airgapwidth=0.254
PolygonConnect [All] p2: connectstyle=Direct reliefconductorwidth=0.254 reliefentries=4 polygonreliefangle="45 Angle" airgapwidth=0.254
RoomDefinition U_Upconversion2 [InComponentClass('U_Upconversion2')] p1: confinementstyle=ConfineIn formatcopy=TRUE lockcomponents=FALSE outline 24.277,21.668 71.412,21.668 71.412,41.388 24.277,41.388
RoomDefinition U_Upconversion1 [InComponentClass('U_Upconversion1')] p2: confinementstyle=ConfineIn formatcopy=TRUE lockcomponents=FALSE outline 18.123,41.388 78.384,41.388 78.384,64.09 18.123,64.09
RoomDefinition U_PWR_Supply-5 [InComponentClass('U_PWR_Supply-5')] p3: confinementstyle=ConfineIn formatcopy=TRUE lockcomponents=FALSE outline 161.214,28.273 42.52,28.273 42.52,-0.152 161.214,-0.152
RoomDefinition U_PWR_Supply [InComponentClass('U_PWR_Supply')] p4: confinementstyle=ConfineIn formatcopy=TRUE lockcomponents=FALSE outline 162.154,73.94 72.234,73.94 72.234,100 162.154,100
RoomDefinition U_LVDS_IFC [InComponentClass('U_LVDS_IFC')] p5: confinementstyle=ConfineIn formatcopy=TRUE lockcomponents=FALSE outline 162.154,67.841 95.925,67.841 95.925,14.9 162.154,14.9
RoomDefinition U_Input_channel2 [InComponentClass('U_Input_channel2')] p6: confinementstyle=ConfineIn formatcopy=TRUE lockcomponents=FALSE outline 49.33,77.005 0.9,77.005 0.9,60.693 49.33,60.693
RoomDefinition U_Input_channel1 [InComponentClass('U_Input_channel1')] p7: confinementstyle=ConfineIn formatcopy=TRUE lockcomponents=FALSE outline 53.086,97.003 -14.656,97.003 -14.656,79.4 53.086,79.4
RoomDefinition U_FPGA_SUP_CFG [InComponentClass('U_FPGA_SUP_CFG')] p8: confinementstyle=ConfineIn formatcopy=TRUE lockcomponents=FALSE outline 92.385,27.883 132.4,27.883 132.4,74.919 92.385,74.919
RoomDefinition U_FPGA_SDRAM [InComponentClass('U_FPGA_SDRAM')] p9: confinementstyle=ConfineIn formatcopy=TRUE lockcomponents=FALSE outline 90.5,15.863 129.077,15.863 129.077,47.401 90.5,47.401
RoomDefinition U_FPGA_GTP [InComponentClass('U_FPGA_GTP')] p10: confinementstyle=ConfineIn formatcopy=TRUE lockcomponents=FALSE outline 160.833,99.162 91.325,99.162 91.325,51.093 160.833,51.093
RoomDefinition U_FPGA_ADC [InComponentClass('U_FPGA_ADC')] p11: confinementstyle=ConfineIn formatcopy=TRUE lockcomponents=FALSE outline 98.019,36.73 127.196,36.73 127.196,70.701 98.019,70.701
RoomDefinition U_DAC_SUPPLY [InComponentClass('U_DAC_SUPPLY')] p12: confinementstyle=ConfineIn formatcopy=TRUE lockcomponents=FALSE outline 79.925,19.17 103.021,19.17 103.021,69.291 79.925,69.291
RoomDefinition U_DAC [InComponentClass('U_DAC')] p13: confinementstyle=ConfineIn formatcopy=TRUE lockcomponents=FALSE outline 109.077,68.595 51.427,68.595 51.427,33.716 109.077,33.716
RoomDefinition U_CLK_INPUT [InComponentClass('U_CLK_INPUT')] p14: confinementstyle=ConfineIn formatcopy=TRUE lockcomponents=FALSE outline 37.084,25.756 -6.909,25.756 -6.909,1.295 37.084,1.295
RoomDefinition U_CFG_FLASH_Update [InComponentClass('U_CFG_FLASH_Update')] p15: confinementstyle=ConfineIn formatcopy=TRUE lockcomponents=FALSE outline 136.208,84.643 95.897,84.643 95.897,63.189 136.208,63.189
RoomDefinition U_ADC_2CH [InComponentClass('U_ADC_2CH')] p16: confinementstyle=ConfineIn formatcopy=TRUE lockcomponents=FALSE outline 80.95,98.4 52.89,98.4 52.89,63.802 80.95,63.802
RoomDefinition Phaser [InComponentClass('Phaser')] p17: confinementstyle=ConfineIn formatcopy=TRUE lockcomponents=FALSE outline 27.788,0.61 -15.164,0.61 -15.164,101.625 27.788,101.625
RoomDefinition Attenuator1 [InComponentClass('Attenuator1')] p18: confinementstyle=ConfineIn formatcopy=TRUE lockcomponents=FALSE outline 28.5,42.26 1.41,42.26 1.41,28.745 28.5,28.745
RoomDefinition Attenuator0 [InComponentClass('Attenuator0')] p19: confinementstyle=ConfineIn formatcopy=TRUE lockcomponents=FALSE outline 25.082,58.693 -4.003,58.693 -4.003,44.5 25.082,44.5
RoutingLayers RoutingLayers_1 [InNetClass('Diff_100Ohm')] p1 off: top layer_v5=TRUE mid layer 1_v5=FALSE mid layer 2_v5=TRUE mid layer 7_v5=TRUE bottom layer_v5=TRUE
RoutingLayers [All] p2: top layer_v5=TRUE mid layer 1_v5=TRUE mid layer 2_v5=TRUE mid layer 7_v5=TRUE bottom layer_v5=TRUE
RoutingTopology RoutingTopology_DDRAddressAndControls [InNetClass('DDR_AddressAndControls')] p1: topology=Daisy_Simple
RoutingTopology [All] p2: topology=Shortest
RoutingVias RoutingVias_diff [InDifferentialPairClass('All Differential Pairs')] p1: holewidth=0.711 width=1.27 viastyle="Through Hole" minholewidth=0.711 minwidth=1.27 maxholewidth=0.711 maxwidth=1.27 useviatemplates=TRUE viatemplateguid#1={CDE9B715-17C5-4857-B78D-82CD05F6E535} viatemplatename#1=v35h15m0mx0
RoutingVias [All] p2: holewidth=0.15 width=0.35 viastyle="Through Hole" minholewidth=0.15 minwidth=0.35 maxholewidth=0.6 maxwidth=0.8
SMDEntry [All] p1 off: side=TRUE corner=TRUE anyangle=FALSE
SilkToSilkClearance [All] p1: silktosilkclearance=0.15
SilkToSolderMaskClearance SilkscreenOverComponentPads [IsPad] p1: minsilkscreentomaskgap=0.15 clearancetoexposedcopper=FALSE
SolderMaskExpansion [All] p1: expansion=0.05 istentingtop=FALSE
StubLength [All] p1: limit=3
UnConnectedPin [All] p1 off:
ViasUnderSMD ViasUnderSMD_1 [(InNet('GND') AND (InComponent('IC1') or InComponent('IC2') or InComponent('IC3') or InComponent('IC14') or InComponent('IC15') or InComponent('IC18')))] p1: allowed=TRUE
ViasUnderSMD [All] p2: allowed=FALSE
Width Width_50Ohm [InNetClass('50Ohm') or InNetClass('50_Ohms')] p1: maxlimit=1 minlimit=0.19 preferedwidth=0.24 toplayer_maxwidth=0.19 toplayer_prefwidth=0.19 midlayer1_minwidth=0.3 midlayer1_prefwidth=0.65 midlayer2_minwidth=0.24 midlayer2_maxwidth=0.24 midlayer7_minwidth=0.24 midlayer7_maxwidth=0.24 bottomlayer_maxwidth=0.19 bottomlayer_prefwidth=0.19 minimp=50.000000 maximp=50.000000 favimp=50.000000
Width [All] p2: maxlimit=2 minlimit=0.075 preferedwidth=0.125
15 further rules are at their usual default settings.

## Classes and differential pairs
net class 100_Ohms: DAC_OUTA_N DAC_OUTA_P DAC_OUTB_N DAC_OUTB_P DAC_OUTC_N DAC_OUTC_P DAC_OUTD_N DAC_OUTD_P NetC36_1 NetC36_2 NetC140_1 NetC140_2 NetC152_1 NetC152_2 NetC381_1 NetC381_2
differential pair class LVPECL: DAC_CLK OSTR
net class DAC: DATA_CLK_N DATA_CLK_P ISTR_PARITYAB_N ISTR_PARITYAB_P LVDSA0_N LVDSA0_P LVDSA1_N LVDSA1_P LVDSA2_N LVDSA2_P LVDSA3_N LVDSA3_P LVDSA4_N LVDSA4_P LVDSA5_N LVDSA5_P LVDSA6_N LVDSA6_P LVDSA7_N LVDSA7_P LVDSA8_N LVDSA8_P LVDSA9_N LVDSA9_P LVDSA10_N LVDSA10_P LVDSA11_N LVDSA11_P LVDSA12_N LVDSA12_P LVDSA13_N LVDSA13_P LVDSA14_N LVDSA14_P LVDSA15_N LVDSA15_P LVDSB0_N LVDSB0_P LVDSB1_N LVDSB1_P LVDSB2_N LVDSB2_P LVDSB3_N LVDSB3_P LVDSB4_N LVDSB4_P LVDSB5_N LVDSB5_P LVDSB6_N LVDSB6_P LVDSB7_N LVDSB7_P LVDSB8_N LVDSB8_P LVDSB9_N LVDSB9_P LVDSB10_N LVDSB10_P LVDSB11_N LVDSB11_P LVDSB12_N LVDSB12_P LVDSB13_N LVDSB13_P LVDSB14_N LVDSB14_P LVDSB15_N LVDSB15_P OSTR_N OSTR_P PARITYCD_N PARITYCD_P SYNC_N SYNC_P
net class EEM1: LVDS8_N LVDS8_P LVDS9_N LVDS9_P LVDS10_N LVDS10_P LVDS11_N LVDS11_P LVDS12_N LVDS12_P LVDS13_N LVDS13_P LVDS14_N LVDS14_P LVDS15_N LVDS15_P
net class EEM0: LVDS0_N LVDS0_P LVDS1_N LVDS1_P LVDS2_N LVDS2_P LVDS3_N LVDS3_P LVDS4_N LVDS4_P LVDS5_N LVDS5_P LVDS6_N LVDS6_P LVDS7_N LVDS7_P
differential pair class EEM1: LVDS8 LVDS9 LVDS10 LVDS11 LVDS12 LVDS13 LVDS14 LVDS15
differential pair class EEM0: LVDS0 LVDS1 LVDS2 LVDS3 LVDS4 LVDS5 LVDS6 LVDS7
component class FPGA_JTAG: C368
differential pair class I_analog: IOUTA IOUTB IOUTC IOUTD
differential pair class Diff_100Ohm: ADC_CLKOUT ADC_CNVn ADC_SCK ADC_SDOA ADC_SDOB BBIA BBIB BBQA BBQB CK_GTP_125 CKC_GTP_125 DATA_CLK IN_0 IN_1 ISTR_PARITYAB LVDSA0 LVDSA1 LVDSA2 LVDSA3 LVDSA4 LVDSA5 LVDSA6 LVDSA7 LVDSA8 LVDSA9 LVDSA10 LVDSA11 LVDSA12 LVDSA13 LVDSA14 LVDSA15 LVDSB0 LVDSB1 LVDSB2 LVDSB3 LVDSB4 LVDSB5 LVDSB6 LVDSB7 LVDSB8 LVDSB9 LVDSB10 LVDSB11 LVDSB12 LVDSB13 LVDSB14 LVDSB15 MGT_RX0 MGT_RX1 MGT_RX2 MGT_RX3 MGT_TX0 MGT_TX1 MGT_TX2 MGT_TX3 PARITYCD SATA_RX0 SATA_RX1 SATA_RX2 SATA_RX3 SATA_TX0 SATA_TX1 SATA_TX2 SATA_TX3 SYNC UPC_REF_CLKA UPC_REF_CLKB
net class POWER: P5V5 P12V0
net class Diff_100Ohm: CK_GTP_125_N CK_GTP_125_P CKC_GTP_125_N CKC_GTP_125_P MGT_RX0_N MGT_RX0_P MGT_RX1_N MGT_RX1_P MGT_RX2_N MGT_RX2_P MGT_RX3_N MGT_RX3_P MGT_TX0_N MGT_TX0_P MGT_TX1_N MGT_TX1_P MGT_TX2_N MGT_TX2_P MGT_TX3_N MGT_TX3_P SATA_RX0_N SATA_RX0_P SATA_RX1_N SATA_RX1_P SATA_RX2_N SATA_RX2_P SATA_RX3_N SATA_RX3_P SATA_TX0_N SATA_TX0_P SATA_TX1_N SATA_TX1_P SATA_TX2_N SATA_TX2_P SATA_TX3_N SATA_TX3_P
net class DDR_BL0: DDR3_DQ0 DDR3_DQ1 DDR3_DQ2 DDR3_DQ3 DDR3_DQ4 DDR3_DQ5 DDR3_DQ6 DDR3_DQ7 DDR3_DQ8 DDR3_DQ9 DDR3_DQ10 DDR3_DQ11 DDR3_DQ12 DDR3_DQ13 DDR3_DQ14 DDR3_DQ15 DDR3_LDM DDR3_LDQS_N DDR3_LDQS_P DDR3_UDM DDR3_UDQS_N DDR3_UDQS_P
net class DDR_AddressAndControls: DDR3_A0 DDR3_A1 DDR3_A2 DDR3_A3 DDR3_A4 DDR3_A5 DDR3_A6 DDR3_A7 DDR3_A8 DDR3_A9 DDR3_A10 DDR3_A11 DDR3_A12 DDR3_A13 DDR3_A14 DDR3_BA0 DDR3_BA1 DDR3_BA2 DDR3_CAS_N DDR3_CK_N DDR3_CK_P DDR3_CKE DDR3_ODT DDR3_RAS_N DDR3_WE_N
net class 50Ohm: DDR3_A0 DDR3_A1 DDR3_A2 DDR3_A3 DDR3_A4 DDR3_A5 DDR3_A6 DDR3_A7 DDR3_A8 DDR3_A9 DDR3_A10 DDR3_A11 DDR3_A12 DDR3_A13 DDR3_A14 DDR3_BA0 DDR3_BA1 DDR3_BA2 DDR3_CAS_N DDR3_CK_N DDR3_CK_P DDR3_CKE DDR3_DQ0 DDR3_DQ1 DDR3_DQ2 DDR3_DQ3 DDR3_DQ4 DDR3_DQ5 DDR3_DQ6 DDR3_DQ7 DDR3_DQ8 DDR3_DQ9 DDR3_DQ10 DDR3_DQ11 DDR3_DQ12 DDR3_DQ13 DDR3_DQ14 DDR3_DQ15 DDR3_LDM DDR3_LDQS_N DDR3_LDQS_P DDR3_ODT DDR3_RAS_N DDR3_UDM DDR3_UDQS_N DDR3_UDQS_P DDR3_WE_N
component class SATA: C185 C186 C187 C188 C192 C193 C197 C198 C199 C200 C201 C202 C203 C204 C205 C206 J10 J11
component class Artix: C50 C51 C57 C60 C61 C62 C63 C64 C65 C95 C97 C98 C99 C100 C101 C112 C113 C114 C115 C116 C120 C122 C124 C125 C220 C240 L4 L5 R42 R43 R48 R89 R91 R92 R93 R94 R95 R96 R191 R233 R238 R239
net class 50_Ohms: NetC43A_2 NetC43B_2 NetC133A_1 NetC133A_2 NetC133B_1 NetC133B_2 NetC190_1 NetC190_2 NetC196_1 NetC196_2 NetC270A_1 NetC270A_2 NetC270B_1 NetC270B_2 NetC272A_2 NetC272B_2 NetC354A_1 NetC354B_1 NetC369A_1 NetC369B_1 NetJ3_1 NetJ4_1 NetJ13_1 NetJ15_1 RF_OUT0 RF_OUT1
component class U_PWR_Supply: C179 C183 C245 C247 C248 C249 C250 C251 C252 C255 C268 C364 C365 C366 C368 D3 D6 D8 D9 HS1 IC7 IC18 IC23 J18 L3 L9 L44 L45 LD1 LD4 LD9 LD10 LD11 LD12 LD13 LD14 LD15 LD16 LD17 LD18 LD19 LD20 LD21 R20 R23 R33 R53 R80 R177 R182 R183 R202 R203 R204 R205 R206 R207 R208 R209 R210 R211 R212 R213 R214 R215 R216 R217 R218 R219 R220 R221 R222 R262 R276 R277 R278 T3 T11 T12 T14 T16 TP1 TP3 TP4 TP5 TP6 TP7 TP8 TP9 TP10 TP11 TP12 TP13 TP14 TP15 TP16 TP17 TP18 TP19 TP20 TP21 TP22 TP23
channel class Upconversion: U_Upconversion1 U_Upconversion2
channel class Attenuator: Attenuator0 Attenuator1
component class U_Upconversion2: B14B B15B B16B B17B B18B B19B C30B C43B C44B C45B C46B C126B C127B C128B C129B C130B C133B C134B C153B C154B C246B C280B C281B C282B C283B C284B C285B C286B C287B C288B C289B C354B C355B C356B C357B C358B HS3B IC2B J14B L19B L20B L22B L24B L25B L27B L29B L31B L33B L34B L35B L38B L52B R38B R41B R49B R71B R193B R194B R195B R196B R224B R225B R226B TR6B
component class U_Upconversion1: B14A B15A B16A B17A B18A B19A C30A C43A C44A C45A C46A C126A C127A C128A C129A C130A C133A C134A C153A C154A C246A C280A C281A C282A C283A C284A C285A C286A C287A C288A C289A C354A C355A C356A C357A C358A HS3A IC2A J14A L19A L20A L22A L24A L25A L27A L29A L31A L33A L34A L35A L38A L52A R38A R41A R49A R71A R193A R194A R195A R196A R224A R225A R226A TR6A
component class U_DAC_SUPPLY: C38 C39 C40 C47 C143 C144 C147 C158 C159 C180 C184 C271 C290 C291 C292 C293 C294 C295 C296 C297 C298 C299 C300 C301 C302 C303 C304 C305 C306 C307 C308 C309 C310 C311 C312 C313 C314 C315 C316 C317 C318 C319 C320 C321 C322 C323 C324 C325 C326 C327 C328 C329 C1009 L7 L11 L14 L17 L41
component class U_CFG_FLASH_Update: C278 C279 IC10 IC17 IC27 R56 R94 R95 R96 R185 R186 R187 R188 R189 R190 R192 T1 T15
channel class Input_channel: U_Input_channel1 U_Input_channel2
component class U_LVDS_IFC: C10 C242 D5 D7 IC6 IC13 IC37 IC38 J1 J12 R70 R78 R82 R84 R140 R141 R142 R144 R145 R146 R148 R149 T6 T7 T8 T9
component class U_Input_channel1: C221A C222A C223A C224A C225A C226A C227A C228A C229A C230A C231A C234A C239A C241A D1A D2A IC15A IC16A L2A R8A R9A R10A R25A R51A R58A R72A R74A R83A R97A R98A R137A R138A RN3A RN4A SW1A
component class U_FPGA_SUP_CFG: C50 C51 C56 C57 C58 C59 C60 C61 C62 C63 C64 C65 C66 C67 C68 C70 C71 C72 C73 C74 C75 C76 C77 C79 C82 C87 C90 C91 C92 C93 C94 C95 C96 C97 C98 C99 C100 C101 C102 C103 C104 C105 C106 C107 C108 C109 C110 C111 C112 C113 C114 C115 C116 C117 C118 C119 C120 C121 C122 C124 C125 C148 C149 C207 C208 C209 C210 C212 C213 C214 C215 C216 C217 C218 C219 C220 C232 C233 C235 C240 D15 D16 J8 L4 L5 L13 L15 L18 L26 LD3 R48 R57 R89 R91 R92 R93 R233 R238 R239 T4
component class U_FPGA_SDRAM: C162 C163 C164 C165 C166 C167 C168 C169 C170 C171 C172 C173 C174 C175 C176 C177 IC8 IC9 R99 R100 R101 R102 R103 R104 R105 R106 R107 R108 R109 R110 R111 R112 R113 R114 R115 R116 R117 R118 R119 R120 R121 R122 R123 R124 R125 R126 R127 R128 R129
component class U_FPGA_ADC: B3 B4 B5 B6 B7 B8 IC4 R42 R43
component class U_DAC: B9 B10 B11 B12 B13 C25 C32 C36 C49 C136 C137 C140 C141 C145 C146 C151 C152 C360 C363 C378 C379 C380 C381 C382 C383 C384 C385 C386 C387 C388 C389 HS2 J13 J15 L1 L6 L12 L21 L23 L28 L30 L32 L36 L37 L39 L40 L53 L54 L55 L56 R2 R3 R11 R12 R13 R15 R16 R17 R21 R24 R31 R32 R34 R35 R36 R37 R39 R40 R50 R54 R59 R61 R62 R63 R65 R66 R67 R68 R69 R76 R77 R85 R86 R88 R184 R227 R228 R229 R230 R231 R232 R246 R247 R248 R249 R250 R251 R252 R253 R254 R258 R263 R264 R265 R266 R267 R268 R269 R270 R271 R272 R273 R274 R275 TR3 TR4 TR5 TR7 TR8 TR9 TR10 TR11 U1
component class U_ADC_2CH: C1 C2 C6 C7 C8 C17 C18 C19 C20 C21 C55 C78 C80 C83 C84 C85 C86 C88 C89 IC1 IC11 IC12 IC24 L8 R1 R4 R5 R6 R7 R55 R90 RN1 RN2
component class U_FPGA_GTP: C185 C186 C187 C188 C192 C193 C197 C198 C199 C200 C201 C202 C203 C204 C205 C206 C236 C237 C238 J9 J10 J11 OSC2 R191
component class U_CLK_INPUT: C3 C4 C5 C9 C12 C13 C26 C27 C54 C81 C123 C131 C189 C190 C194 C196 C359 C362 IC5 L10 LD7 R22 R27 R44 R45 R46 R47 R52 R73 R81 R163 R165 R245 T5 TR1 TR2
component class Phaser: B1 B2 C11 C31 C33 C34 C35 C37 C41 C243 C244 FTG1 FTG2 FTG3 FTG4 IC34 J2 J3 J4 J5 J6 J7 J16 J17 LD2 LD5 LD6 LD8 R14 R26 R28 R29 R30 R64 R75 R147 R150 R151 R152 R153 R156 R157 R158 R159 R160 R161 R170 R234 R235 R236 R242 R243 R244 R257 R259 R260 R261 T2 T13 WASHER1 WASHER2 WASHER3 WASHER4 WASHER5 WASHER6 WASHER7 WASHER8 WASHER9 WASHER10
component class Attenuator0: C14A C15A C16A C22A C23A C24A C270A C272A C273A C274A C275A C276A C277A C369A C370A C371A C372A C373A C374A C375A C376A C377A IC3A L16A
component class U_Input_channel2: C221B C222B C223B C224B C225B C226B C227B C228B C229B C230B C231B C234B C239B C241B D1B D2B IC15B IC16B L2B R8B R9B R10B R25B R51B R58B R72B R74B R83B R97B R98B R137B R138B RN3B RN4B SW1B
component class Attenuator1: C14B C15B C16B C22B C23B C24B C270B C272B C273B C274B C275B C276B C277B C369B C370B C371B C372B C373B C374B C375B C376B C377B IC3B L16B
component class U_PWR_Supply-5: C28 C42 C48 C69 C132 C139 C155 C156 C160 C161 C178 C181 C182 C191 C195 C211 C253 C254 C256 C257 C258 C259 C260 C261 C262 C263 C264 C265 C266 C267 C269 C330 C331 C332 C333 C334 C335 C336 C337 C338 C339 C340 C341 C342 C343 C344 C345 C346 C347 C348 C349 C350 C351 C352 C353 C361 C367 IC14 IC19 IC20 IC21 IC22 IC25 IC26 IC28 IC29 IC30 IC31 IC32 IC33 IC35 IC36 L42 L43 L46 L47 L48 L49 L50 L51 R18 R19 R60 R87 R130 R131 R132 R133 R134 R135 R136 R139 R143 R154 R155 R162 R164 R166 R167 R168 R169 R171 R172 R173 R174 R175 R176 R178 R179 R180 R181 R197 R198 R199 R200 R201 R223 R240 R241 R255 R256 T10 TP2
net class LED[5..0]: LED0 LED1 LED2 LED3 LED4 LED5
differential pair CPCIS_CLK: +CPCIS_CLK_P -CPCIS_CLK_N
differential pair SYNC: +SYNC_P -SYNC_N
differential pair PARITYCD: +PARITYCD_P -PARITYCD_N
differential pair OSTR: +OSTR_P -OSTR_N
differential pair LVDSB15: +LVDSB15_P -LVDSB15_N
differential pair LVDSB14: +LVDSB14_P -LVDSB14_N
differential pair LVDSB13: +LVDSB13_P -LVDSB13_N
differential pair LVDSB12: +LVDSB12_P -LVDSB12_N
differential pair LVDSB11: +LVDSB11_P -LVDSB11_N
differential pair LVDSB10: +LVDSB10_P -LVDSB10_N
differential pair LVDSB9: +LVDSB9_P -LVDSB9_N
differential pair LVDSB8: +LVDSB8_P -LVDSB8_N
differential pair LVDSB7: +LVDSB7_P -LVDSB7_N
differential pair LVDSB6: +LVDSB6_P -LVDSB6_N
differential pair LVDSB5: +LVDSB5_P -LVDSB5_N
differential pair LVDSB4: +LVDSB4_P -LVDSB4_N
differential pair LVDSB3: +LVDSB3_P -LVDSB3_N
differential pair LVDSB2: +LVDSB2_P -LVDSB2_N
differential pair LVDSB1: +LVDSB1_P -LVDSB1_N
differential pair LVDSB0: +LVDSB0_P -LVDSB0_N
differential pair LVDSA15: +LVDSA15_P -LVDSA15_N
differential pair LVDSA14: +LVDSA14_P -LVDSA14_N
differential pair LVDSA13: +LVDSA13_P -LVDSA13_N
differential pair LVDSA12: +LVDSA12_P -LVDSA12_N
differential pair LVDSA11: +LVDSA11_P -LVDSA11_N
differential pair LVDSA10: +LVDSA10_P -LVDSA10_N
differential pair LVDSA9: +LVDSA9_P -LVDSA9_N
differential pair LVDSA8: +LVDSA8_P -LVDSA8_N
differential pair LVDSA7: +LVDSA7_P -LVDSA7_N
differential pair LVDSA6: +LVDSA6_P -LVDSA6_N
differential pair LVDSA5: +LVDSA5_P -LVDSA5_N
differential pair LVDSA4: +LVDSA4_P -LVDSA4_N
differential pair LVDSA3: +LVDSA3_P -LVDSA3_N
differential pair LVDSA2: +LVDSA2_P -LVDSA2_N
differential pair LVDSA1: +LVDSA1_P -LVDSA1_N
differential pair LVDSA0: +LVDSA0_P -LVDSA0_N
differential pair ISTR_PARITYAB: +ISTR_PARITYAB_P -ISTR_PARITYAB_N
differential pair DATA_CLK: +DATA_CLK_P -DATA_CLK_N
differential pair DAC_OUTD: +DAC_OUTD_P -DAC_OUTD_N
differential pair DAC_OUTC: +DAC_OUTC_P -DAC_OUTC_N
differential pair DAC_OUTB: +DAC_OUTB_P -DAC_OUTB_N
differential pair DAC_OUTA: +DAC_OUTA_P -DAC_OUTA_N
differential pair UPC_REF_CLKB: +UPC_REF_CLKB_P -UPC_REF_CLKB_N
differential pair UPC_REF_CLKA: +UPC_REF_CLKA_P -UPC_REF_CLKA_N
differential pair SATA_TX3: +SATA_TX3_P -SATA_TX3_N
differential pair SATA_TX2: +SATA_TX2_P -SATA_TX2_N
differential pair SATA_TX1: +SATA_TX1_P -SATA_TX1_N
differential pair SATA_TX0: +SATA_TX0_P -SATA_TX0_N
differential pair SATA_RX3: +SATA_RX3_P -SATA_RX3_N
differential pair SATA_RX2: +SATA_RX2_P -SATA_RX2_N
differential pair SATA_RX1: +SATA_RX1_P -SATA_RX1_N
differential pair SATA_RX0: +SATA_RX0_P -SATA_RX0_N
differential pair MGT_TX2: +MGT_TX2_P -MGT_TX2_N
differential pair MGT_TX1: +MGT_TX1_P -MGT_TX1_N
differential pair MGT_TX0: +MGT_TX0_P -MGT_TX0_N
differential pair MGT_RX2: +MGT_RX2_P -MGT_RX2_N
differential pair MGT_RX1: +MGT_RX1_P -MGT_RX1_N
differential pair MGT_RX0: +MGT_RX0_P -MGT_RX0_N
differential pair BBQA: +BBQA_P -BBQA_N
differential pair BBIA: +BBIA_P -BBIA_N
differential pair DAC_CLK: +DAC_CLK_P -DAC_CLK_N
differential pair BBQB: +BBQB_P -BBQB_N
differential pair BBIB: +BBIB_P -BBIB_N
differential pair MGT_TX3: +MGT_TX3_P -MGT_TX3_N
differential pair MGT_RX3: +MGT_RX3_P -MGT_RX3_N
differential pair LVDS15: +LVDS15_P -LVDS15_N
differential pair LVDS14: +LVDS14_P -LVDS14_N
differential pair LVDS13: +LVDS13_P -LVDS13_N
differential pair LVDS12: +LVDS12_P -LVDS12_N
differential pair LVDS11: +LVDS11_P -LVDS11_N
differential pair LVDS10: +LVDS10_P -LVDS10_N
differential pair LVDS9: +LVDS9_P -LVDS9_N
differential pair LVDS8: +LVDS8_P -LVDS8_N
differential pair LVDS7: +LVDS7_P -LVDS7_N
differential pair LVDS6: +LVDS6_P -LVDS6_N
differential pair LVDS5: +LVDS5_P -LVDS5_N
differential pair LVDS4: +LVDS4_P -LVDS4_N
differential pair LVDS3: +LVDS3_P -LVDS3_N
differential pair LVDS2: +LVDS2_P -LVDS2_N
differential pair LVDS1: +LVDS1_P -LVDS1_N
differential pair LVDS0: +LVDS0_P -LVDS0_N
differential pair IOUTD: +IOUTD_P -IOUTD_N
differential pair IOUTC: +IOUTC_P -IOUTC_N
differential pair IOUTB: +IOUTB_P -IOUTB_N
differential pair IOUTA: +IOUTA_P -IOUTA_N
differential pair IN_1: +IN_1_P -IN_1_N
differential pair IN_0: +IN_0_P -IN_0_N
differential pair DDR3_UDQS: +DDR3_UDQS_P -DDR3_UDQS_N
differential pair DDR3_LDQS: +DDR3_LDQS_P -DDR3_LDQS_N
differential pair DDR3_CK: +DDR3_CK_P -DDR3_CK_N
differential pair CKC_GTP_125: +CKC_GTP_125_P -CKC_GTP_125_N
differential pair CK_GTP: +CK_GTP_P -CK_GTP_N
differential pair CK_GTP_125: +CK_GTP_125_P -CK_GTP_125_N
differential pair ADC_SDOB: +ADC_SDOB_P -ADC_SDOB_N
differential pair ADC_SDOA: +ADC_SDOA_P -ADC_SDOA_N
differential pair ADC_SCK: +ADC_SCK_P -ADC_SCK_N
differential pair ADC_CNVn: +ADC_CNVn_P -ADC_CNVn_N
differential pair ADC_CLKOUT: +ADC_CLKOUT_P -ADC_CLKOUT_N
differential pair CK_SMA: +CK_SMA_P -CK_SMA_N
differential pair CK_MMCX: +CK_MMCX_P -CK_MMCX_N
differential pair CK_MMCX_IN: +CK_MMCX_IN_P -CK_MMCX_IN_N
differential pair CK_SMA_IN: +CK_SMA_IN_P -CK_SMA_IN_N

## Components (designator, comment, footprint, x,y, rotation, side; value= is the part's Value field where it differs from the comment)
B1 "Plated Hole" MTG270_500 3.556,94.412 r90 top locked
B2 "Plated Hole" MTG270_500 3.556,5.512 r90 top locked
B3 "SMD Pad" C100 146.495,74.75 r0 top
B4 "SMD Pad" C100 145.695,73.3 r0 top
B5 "SMD Pad" C100 144.895,74.75 r0 top
B6 "SMD Pad" C100 144.095,73.3 r0 top
B7 "SMD Pad" C100 143.295,74.75 r0 top
B8 "SMD Pad" C100 142.495,73.3 r0 top
B9 "SMD Pad" C100 89.693,60.75 r90 top
B10 "SMD Pad" C100 87.293,62.225 r180 top
B11 "SMD Pad" C100 86.493,60.775 r180 top
B12 "SMD Pad" C100 88.093,60.75 r180 top
B13 "SMD Pad" C100 88.893,62.15 r180 top
B14A "SMD Pad" C100 43.419,38.05 r180 top (schematic designator B14)
B14B "SMD Pad" C100 43.419,59.05 r90 top (schematic designator B14)
B15A "SMD Pad" C100 42.05,38.05 r180 top (schematic designator B15)
B15B "SMD Pad" C100 42.05,59.05 r90 top (schematic designator B15)
B16A "SMD Pad" C100 40.611,38.05 r180 top (schematic designator B16)
B16B "SMD Pad" C100 40.611,59.05 r90 top (schematic designator B16)
B17A "SMD Pad" C100 37.823,38.05 r180 top (schematic designator B17)
B17B "SMD Pad" C100 37.823,59.05 r90 top (schematic designator B17)
B18A "SMD Pad" C100 39.025,34.125 r180 top (schematic designator B18)
B18B "SMD Pad" C100 39.025,55.125 r90 top (schematic designator B18)
B19A "SMD Pad" C100 39.154,38.05 r180 top (schematic designator B19)
B19B "SMD Pad" C100 39.154,59.05 r90 top (schematic designator B19)
C1 "100nF" CAPC1608X87N 66.9,78.525 r180 top
C2 "10uF" CAPC2012X95N 68.175,68.75 r0 top
C3 "100nF" CAPC1005X55N 73.218,26.51 r90 top
C4 "100nF" CAPC1005X55N 72.393,26.51 r90 top
C5 "100nF" CAPC1005X55N 70.443,24.56 r180 top
C6 "1uF" CAPC1608X87N 70.175,79.125 r270 top
C7 "1uF" CAPC1608X87N 70.325,69.375 r90 top
C8 "100nF" CAPC1608X87N 68.2,70.225 r180 top
C9 "100nF" CAPC1005X55N 70.443,23.735 r180 top
C10 "100nF" CAPC1005X55N 148.35,19.35 r0 top
C11 "10nF" CAPC1005X55N 8.006,81.35 r270 top
C12 "100nF" CAPC1005X55N 70.443,22.91 r180 top
C13 "100nF" CAPC1005X55N 70.443,22.085 r180 top
C14A "1uF" CAPC1005X55N 21,54.3 r180 top (schematic designator C14)
C14B "1uF" CAPC1005X55N 21.05,37.304 r180 top (schematic designator C14)
C15A "1uF" CAPC1005X55N 19.796,55.865 r270 top (schematic designator C15)
C15B "1uF" CAPC1005X55N 19.846,38.868 r270 top (schematic designator C15)
C16A "1uF" CAPC1005X55N 18.896,55.865 r270 top (schematic designator C16)
C16B "1uF" CAPC1005X55N 18.946,38.868 r270 top (schematic designator C16)
C17 "100nF" CAPC1608X87N 64.1,78.627 r270 top
C18 "100nF" CAPC1608X87N 64.675,71.325 r0 top
C19 "10uF" CAPC2012X95N 64.525,69.825 r0 top
C20 "100nF" CAPC1608X87N 72.925,70.95 r90 top
C21 "100nF" CAPC1608X87N 71.65,70.95 r90 top
C22A "100nF" CAPC1005X55N 20.825,49.55 r90 top (schematic designator C22)
C22B "100nF" CAPC1005X55N 20.875,32.554 r90 top (schematic designator C22)
C23A "1nF" CAPC1005X55N 19.525,48.75 r180 top (schematic designator C23)
C23B "1nF" CAPC1005X55N 19.575,31.754 r180 top (schematic designator C23)
C24A "100pF" CAPC1005X55N 21.125,51.55 r180 top (schematic designator C24)
C24B "100pF" CAPC1005X55N 21.175,34.554 r180 top (schematic designator C24)
C25 "100nF" CAPC1005X55N 85.118,53.925 r180 bottom
C26 "100nF" CAPC1005X55N 74.843,26.51 r90 top
C27 "100nF" CAPC1005X55N 74.018,26.51 r90 top
C28 "22uF" CAPC2012X135N 99.125,24.9 r180 top
C30A "1uF" CAPC1005X55N 45.404,19.229 r180 top (schematic designator C30)
C30B "1uF" CAPC1005X55N 44.504,40.229 r180 top (schematic designator C30)
C31 "10nF" CAPC1005X55N 8.601,74.525 r90 top
C32 "100nF" CAPC1608X90N 78.359,50.47 r270 bottom
C33 "10nF" CAPC1005X55N 9.615,50.15 r0 top
C34 "10nF" CAPC1005X55N 9.498,55.007 r180 top
C35 "10nF" CAPC1005X55N 10.07,38.015 r0 top
C36 "12pF" CAPC1608X87N 71.239,39.587 r270 top
C37 "10nF" CAPC1005X55N 10.29,22.528 r0 top
C38 "220nF" CAPC0603X33N 86.871,53.6 r0 bottom
C39 "220nF" CAPC0603X33N 88.218,48.875 r90 bottom
C40 "220nF" CAPC0603X33N 87.25,57.119 r270 bottom
C41 "10nF" CAPC1005X55N 9.741,33.2 r180 top
C42 "10uF" CAPC2012X135N 90.547,77.75 r0 top
C43A "100pF" CAPC1005X55N 54.087,27.299 r180 top (schematic designator C43)
C43B "100pF" CAPC1005X55N 46.775,58.375 r180 top (schematic designator C43)
C44A "4.7pF" CAPC1005X55N 39.835,29.765 r270 top (schematic designator C44)
C44B "4.7pF" CAPC1005X55N 39.835,50.765 r270 top (schematic designator C44)
C45A "100pF" CAPC1005X55N 35.382,35.107 r270 top (schematic designator C45)
C45B "100pF" CAPC1005X55N 35.391,56.116 r270 top (schematic designator C45)
C46A "100pF" CAPC1005X55N 46.541,22.425 r180 top (schematic designator C46)
C46B "100pF" CAPC1005X55N 45.616,43.425 r180 top (schematic designator C46)
C47 "220nF" CAPC0603X33N 86.55,57.119 r270 bottom
C48 "100nF" CAPC1005X55N 57.748,57.994 r0 bottom
C49 "12pF" CAPC1608X87N 78.121,46.523 r90 top
C50 "22uF" CAPC1709X100N 111.165,50.275 r180 bottom
C51 "100nF" CAPC0603X33N 111.15,48.275 r90 bottom
C54 "100nF" CAPC1005X55N 15.925,17.675 r90 top
C55 "100nF" CAPC1608X87N 64.425,65.125 r270 top
C56 "100uF" CAPC3225X270N 129.019,58.56 r270 top
C57 "22uF" CAPC1709X100N 99.789,48.2 r0 bottom
C58 "100uF" CAPC3225X270N 138.127,80.373 r90 top
C59 "4.7uF" CAPC2012X135N 129.275,37.2 r180 top
C60 "22uF" CAPC1709X100N 112.525,43.825 r270 bottom
C61 "470nF" CAPC0603X33N 118.675,60.85 r180 bottom
C62 "470nF" CAPC0603X33N 114.675,57.825 r0 bottom
C63 "470nF" CAPC0603X33N 122.175,41.325 r90 bottom
C64 "470nF" CAPC0603X33N 117.675,51.825 r0 bottom
C65 "470nF" CAPC0603X33N 109.175,40.353 r90 bottom
C66 "4.7uF" CAPC2012X135N 123.675,53.325 r90 bottom
C67 "4.7uF" CAPC2012X135N 121.675,52.535 r90 bottom
C68 "470nF" CAPC0603X33N 114.175,59.325 r90 bottom
C69 "1uF" CAPC1005X55N 96.05,23.929 r270 top
C70 "470nF" CAPC0603X33N 106.3,50.337 r90 bottom
C71 "4.7uF" CAPC2012X135N 107.301,68.859 r0 bottom
C72 "4.7uF" CAPC2012X135N 107.301,65.143 r0 bottom
C73 "470nF" CAPC0603X33N 114.175,54.325 r270 bottom
C74 "470nF" CAPC0603X33N 106.679,53.845 r180 bottom
C75 "470nF" CAPC0603X33N 102.675,55.325 r180 bottom
C76 "4.7uF" CAPC2012X135N 125.465,40.153 r180 bottom
C77 "4.7uF" CAPC2012X135N 125.465,42.027 r180 bottom
C78 "10uF" CAPC2012X95N 74.425,70.875 r90 top
C79 "470nF" CAPC0603X33N 117.175,44.325 r270 bottom
C80 "10uF" CAPC2012X95N 66.85,80.075 r0 top
C81 "100nF" CAPC1005X55N 15.925,19.475 r270 top
C82 "4.7uF" CAPC2012X135N 117.71,54.136 r90 bottom
C83 "10uF" CAPC2012X95N 75.525,88.75 r270 top
C84 "1uF" CAPC1608X87N 72.445,94.025 r0 top
C85 "2.2uF" CAPC1608X87N 72.595,86.475 r0 top
C86 "47nF" CAPC2012X135N 66.885,82.687 r180 top
C87 "4.7uF" CAPC2012X135N 105.865,36.378 r90 bottom
C88 "100nF" CAPC1005X55N 63.41,88.517 r90 top
C89 "47nF" CAPC2012X135N 68.285,88.062 r90 top
C90 "470nF" CAPC0603X33N 106.15,41.325 r270 bottom
C91 "330uF" CAPMP7343X190N 128.9,45.175 r270 top
C92 "4.7uF" CAPC2012X135N 128.85,49.5 r180 bottom
C93 "4.7uF" CAPC2012X135N 128.875,52.55 r180 top
C94 "4.7uF" CAPC2012X135N 128.85,50.85 r180 top
C95 "470nF" CAPC0603X33N 116.175,45.325 r90 bottom
C96 "4.7uF" CAPC2012X135N 121.65,50.1 r0 bottom
C97 "470nF" CAPC0603X33N 102.175,47.325 r90 bottom
C98 "470nF" CAPC0603X33N 112.898,51.8 r0 bottom
C99 "470nF" CAPC0603X33N 108.675,48.825 r0 bottom
C100 "470nF" CAPC0603X33N 106.15,45.375 r90 bottom
C101 "22uF" CAPC1709X100N 99.067,42.363 r0 top
C102 "470nF" CAPC0603X33N 117.675,48.825 r180 bottom
C103 "470nF" CAPC0603X33N 114.175,45.325 r90 bottom
C104 "470nF" CAPC0603X33N 111.175,45.325 r90 bottom
C105 "470nF" CAPC0603X33N 117.675,46.825 r180 bottom
C106 "470nF" CAPC0603X33N 115.675,47.825 r180 bottom
C107 "470nF" CAPC0603X33N 109.175,45.325 r90 bottom
C108 "470nF" CAPC0603X33N 108.675,47.825 r0 bottom
C109 "4.7uF" CAPC2012X135N 121.625,48.4 r0 bottom
C110 "4.7uF" CAPC2012X135N 128.875,51.5 r180 bottom
C111 "4.7uF" CAPC2012X135N 129.175,37.175 r180 bottom
C112 "100nF" CAPC0603X33N 102.15,49.375 r90 bottom
C113 "100nF" CAPC0603X33N 104.175,46.325 r90 bottom
C114 "100nF" CAPC0603X33N 102.175,45.325 r90 bottom
C115 "100nF" CAPC0603X33N 102.175,43.325 r90 bottom
C116 "100nF" CAPC0603X33N 104.175,42.325 r90 bottom
C117 "470nF" CAPC0603X33N 108.175,51.8 r0 bottom
C118 "470nF" CAPC0603X33N 110.175,51.8 r0 bottom
C119 "470nF" CAPC0603X33N 116.175,49.325 r90 bottom
C120 "100nF" CAPC0603X33N 110.175,48.325 r90 bottom
C121 "470nF" CAPC0603X33N 112.65,49.075 r180 bottom
C122 "100nF" CAPC0603X33N 114.675,48.825 r180 bottom
C123 "1uF" CAPC1005X55N 76.693,21.06 r180 top
C124 "100nF" CAPC0603X33N 106.175,47.325 r270 bottom
C125 "100nF" CAPC0603X33N 104.175,48.325 r90 bottom
C126A "1uF" CAPC1005X55N 39.871,31.511 r0 top (schematic designator C126)
C126B "1uF" CAPC1005X55N 39.871,52.511 r0 top (schematic designator C126)
C127A "4.7pF" CAPC1005X55N 35.5,24.365 r90 top (schematic designator C127)
C127B "4.7pF" CAPC1005X55N 35.507,45.378 r90 top (schematic designator C127)
C128A "1uF" CAPC1005X55N 36.424,23.347 r90 top (schematic designator C128)
C128B "1uF" CAPC1005X55N 36.424,44.347 r90 top (schematic designator C128)
C129A "1uF" CAPC1005X55N 37.648,35.17 r270 top (schematic designator C129)
C129B "1uF" CAPC1005X55N 37.648,56.17 r270 top (schematic designator C129)
C130A "1nF" CAPC1005X55N 36.754,35.164 r270 top (schematic designator C130)
C130B "1nF" CAPC1005X55N 36.748,56.158 r270 top (schematic designator C130)
C131 "100nF" CAPC1005X55N 76.693,21.935 r180 top
C132 "22uF" CAPC2012X135N 43.275,5.245 r270 top
C133A "100pF" CAPC1005X55N 42.725,26.25 r180 top (schematic designator C133)
C133B "100pF" CAPC1005X55N 42.058,47.25 r180 top (schematic designator C133)
C134A "4.7pF" CAPC1005X55N 34.461,35.107 r270 top (schematic designator C134)
C134B "4.7pF" CAPC1005X55N 34.461,56.107 r270 top (schematic designator C134)
C136 "12pF" CAPC1608X87N 78.244,39.464 r270 top
C137 "20pF" CAPC1608X87N 74.655,46.55 r90 top
C139 "47uF" CAPC3225X270N 138.9,8.325 r0 top
C140 "12pF" CAPC1608X87N 71.025,46.585 r90 top
C141 "12pF" CAPC1608X87N 77.927,53.416 r270 top
C143 "220nF" CAPC0603X33N 86.871,54.26 r0 bottom
C144 "220nF" CAPC0603X33N 84.571,56.1 r270 bottom
C145 "10uF" CAPC2012X95N 82.527,52.916 r0 bottom
C146 "1nF" CAPC1608X90N 82.906,49.682 r180 bottom
C147 "220nF" CAPC0603X33N 83.862,61.456 r90 top
C148 "22uF" CAPC1709X100N 99.789,46.712 r0 bottom
C149 "22uF" CAPC1709X100N 128.939,55.7 r180 top
C151 "20pF" CAPC1608X87N 74.371,53.34 r270 top
C152 "12pF" CAPC1608X87N 70.866,53.442 r270 top
C153A "4.7pF" CAPC1005X55N 28.475,28.725 r90 top (schematic designator C153)
C153B "4.7pF" CAPC1005X55N 28.475,49.671 r90 top (schematic designator C153)
C154A "4.7pF" CAPC1005X55N 29.637,28.069 r90 top (schematic designator C154)
C154B "4.7pF" CAPC1005X55N 29.637,49.069 r90 top (schematic designator C154)
C155 "10uF" CAPC2012X135N 37.36,16.99 r180 top
C156 "22uF" CAPMP3528X210N 46.598,5.396 r90 top
C158 "220nF" CAPC0603X33N 84.663,61.456 r90 top
C159 "220nF" CAPC0603X33N 85.462,61.456 r90 top
C160 "1uF" CAPC1005X55N 65.075,8.525 r270 top
C161 "10nF" CAPC1005X55N 97.289,84.877 r180 top
C162 "100nF" CAPC0603X33N 116.215,28.753 r270 bottom
C163 "100nF" CAPC0603X33N 112.367,20.111 r0 top
C164 "100nF" CAPC0603X33N 114.74,28.928 r270 bottom
C165 "100nF" CAPC0603X33N 110.647,28.046 r90 bottom
C166 "100nF" CAPC0603X33N 107.947,22.261 r270 bottom
C167 "100nF" CAPC0603X33N 108.992,28.003 r270 bottom
C168 "100nF" CAPC0603X33N 119.29,29.678 r270 bottom
C169 "100nF" CAPC0603X33N 114.365,19.028 r90 top
C170 "100nF" CAPC0603X33N 110.365,21.724 r180 bottom
C171 "100nF" CAPC0603X33N 119.24,19.503 r90 top
C172 "1uF" CAPC1005X55N 109.153,17.187 r90 top
C173 "22uF" CAPC1709X100N 115.678,15.312 r270 top
C174 "22uF" CAPC1709X100N 114.303,15.312 r270 top
C175 "10nF" CAPC1005X55N 108.253,15.187 r270 top
C176 "22uF" CAPC1709X100N 111.653,12.812 r180 top
C177 "100nF" CAPC0603X33N 113.592,19.761 r90 top
C178 "47uF" CAPC3225X270N 139.725,12.85 r270 top
C179 "10uF" CAPC2012X135N 46.075,94.025 r270 top
C180 "22uF" CAPMP3528X210N 80.943,63.85 r180 top
C181 "10uF" CAPC2012X135N 151.825,13.05 r90 top
C182 "100nF" CAPC1005X55N 149.025,14.125 r0 top
C183 "22uF" CAPC2012X135N 93.925,93.392 r270 top
C184 "22uF" CAPMP3528X210N 80.943,67.3 r180 top
C185 "100nF" CAPC0603X33N 148.339,58.7 r0 top
C186 "100nF" CAPC0603X33N 148.339,59.335 r0 top
C187 "100nF" CAPC0603X33N 147.754,60.631 r0 top
C188 "100nF" CAPC0603X33N 147.754,61.266 r0 top
C189 "100nF" CAPC1005X55N 143.081,67.842 r180 top
C190 "100nF" CAPC1005X55N 151.308,66.802 r180 top
C191 "47uF" CAPC3225X270N 97.55,33.742 r0 top
C192 "100nF" CAPC0603X33N 135.895,90.648 r0 top
C193 "100nF" CAPC0603X33N 135.895,89.948 r0 top
C194 "100nF" CAPC1005X55N 143.035,66.875 r180 top
C195 "1uF" CAPC1005X55N 102.525,26.496 r270 top
C196 "100nF" CAPC1005X55N 8.275,18.5 r0 top
C197 "100nF" CAPC0603X33N 135.895,86.838 r0 top
C198 "100nF" CAPC0603X33N 137.498,62.603 r90 top
C199 "100nF" CAPC0603X33N 138.133,62.603 r90 top
C200 "100nF" CAPC0603X33N 139.299,62.518 r90 top
C201 "100nF" CAPC0603X33N 140.049,62.518 r90 top
C202 "100nF" CAPC0603X33N 135.895,86.138 r0 top
C203 "100nF" CAPC0603X33N 126.42,90.653 r0 top
C204 "100nF" CAPC0603X33N 126.42,89.953 r0 top
C205 "100nF" CAPC0603X33N 126.42,86.843 r0 top
C206 "100nF" CAPC0603X33N 126.42,86.143 r0 top
C207 "470nF" CAPC0603X33N 103.193,60.799 r0 bottom
C208 "470nF" CAPC0603X33N 123.165,46.33 r270 bottom
C209 "4.7uF" CAPC2012X135N 107.304,67.02 r0 bottom
C210 "470nF" CAPC0603X33N 122.675,58.825 r180 bottom
C211 "1nF" CAPC1608X87N 140.575,5.225 r90 top
C212 "470nF" CAPC0603X33N 118.175,57.325 r90 bottom
C213 "4.7uF" CAPC2012X135N 115.79,36.503 r90 bottom
C214 "470nF" CAPC0603X33N 108.175,44.325 r90 bottom
C215 "470nF" CAPC0603X33N 114.675,41.825 r180 bottom
C216 "470nF" CAPC0603X33N 120.675,43.825 r180 bottom
C217 "470nF" CAPC0603X33N 111.175,60.325 r270 bottom
C218 "47uF" CAPC3225X270N 107.086,67.355 r0 top
C219 "470nF" CAPC0603X33N 115.675,51.825 r180 bottom
C220 "100nF" CAPC0603X33N 104.175,44.325 r90 bottom
C221A "8.2pF" CAPC1608X87N 31.45,69.755 r270 top (schematic designator C221)
C221B "8.2pF" CAPC1608X87N 31.4,86.805 r270 top (schematic designator C221)
C222A "39pF" CAPC1608X87N 29.95,68.155 r90 top (schematic designator C222)
C222B "39pF" CAPC1608X87N 29.9,85.205 r90 top (schematic designator C222)
C223A "47nF" CAPC2012X135N 40.325,65.605 r90 top (schematic designator C223)
C223B "47nF" CAPC2012X135N 40.275,82.63 r90 top (schematic designator C223)
C224A "1nF" CAPC1608X90N 49.14,67.283 r270 top (schematic designator C224)
C224B "1nF" CAPC1608X90N 49.104,84.323 r270 top (schematic designator C224)
C225A "8.2pF" CAPC1608X87N 31.45,66.555 r90 top (schematic designator C225)
C225B "8.2pF" CAPC1608X87N 31.4,83.605 r90 top (schematic designator C225)
C226A "1nF" CAPC1608X90N 64.618,73.584 r90 top (schematic designator C226)
C226B "1nF" CAPC1608X90N 63.094,75.413 r90 top (schematic designator C226)
C227A "1nF" CAPC1608X90N 49.14,64.583 r270 top (schematic designator C227)
C227B "1nF" CAPC1608X90N 49.104,81.623 r270 top (schematic designator C227)
C228A "10uF" CAPMP3216X180N 37.025,73.405 r180 top (schematic designator C228)
C228B "10uF" CAPMP3216X180N 36.975,90.43 r180 top (schematic designator C228)
C229A "100nF" CAPC1005X55N 37,71.93 r0 top (schematic designator C229)
C229B "100nF" CAPC1005X55N 36.95,88.955 r0 top (schematic designator C229)
C230A "100nF" CAPC1005X55N 37.075,64.405 r0 top (schematic designator C230)
C230B "100nF" CAPC1005X55N 37.075,81.23 r0 top (schematic designator C230)
C231A "10uF" CAPMP3216X180N 37.1,62.88 r0 top (schematic designator C231)
C231B "10uF" CAPMP3216X180N 37.05,79.905 r0 top (schematic designator C231)
C232 "100nF" CAPC0603X33N 124.95,15.7 r270 top
C233 "22uF" CAPC1709X100N 112.557,53.925 r270 bottom
C234A "47nF" CAPC2012X135N 41.225,62.88 r0 top (schematic designator C234)
C234B "47nF" CAPC2012X135N 41.175,79.905 r0 top (schematic designator C234)
C235 "47uF" CAPC3225X270N 129.175,33.9 r90 top